# Altium PCB DB46.PcbDoc (part 1 of 6)
Units mm, origin at the board's own origin, x right, y up, seen from the top; angles counter-clockwise.
Board outline 82.2 x 113.2 mm, 8 copper layers (Top Layer, MidLayer1, MidLayer2, GND, MidLayer3, VCC, MidLayer4, Bottom Layer), stack 1.576 mm thick; 186 components, 477 nets, 1727 pads, 1538 vias.
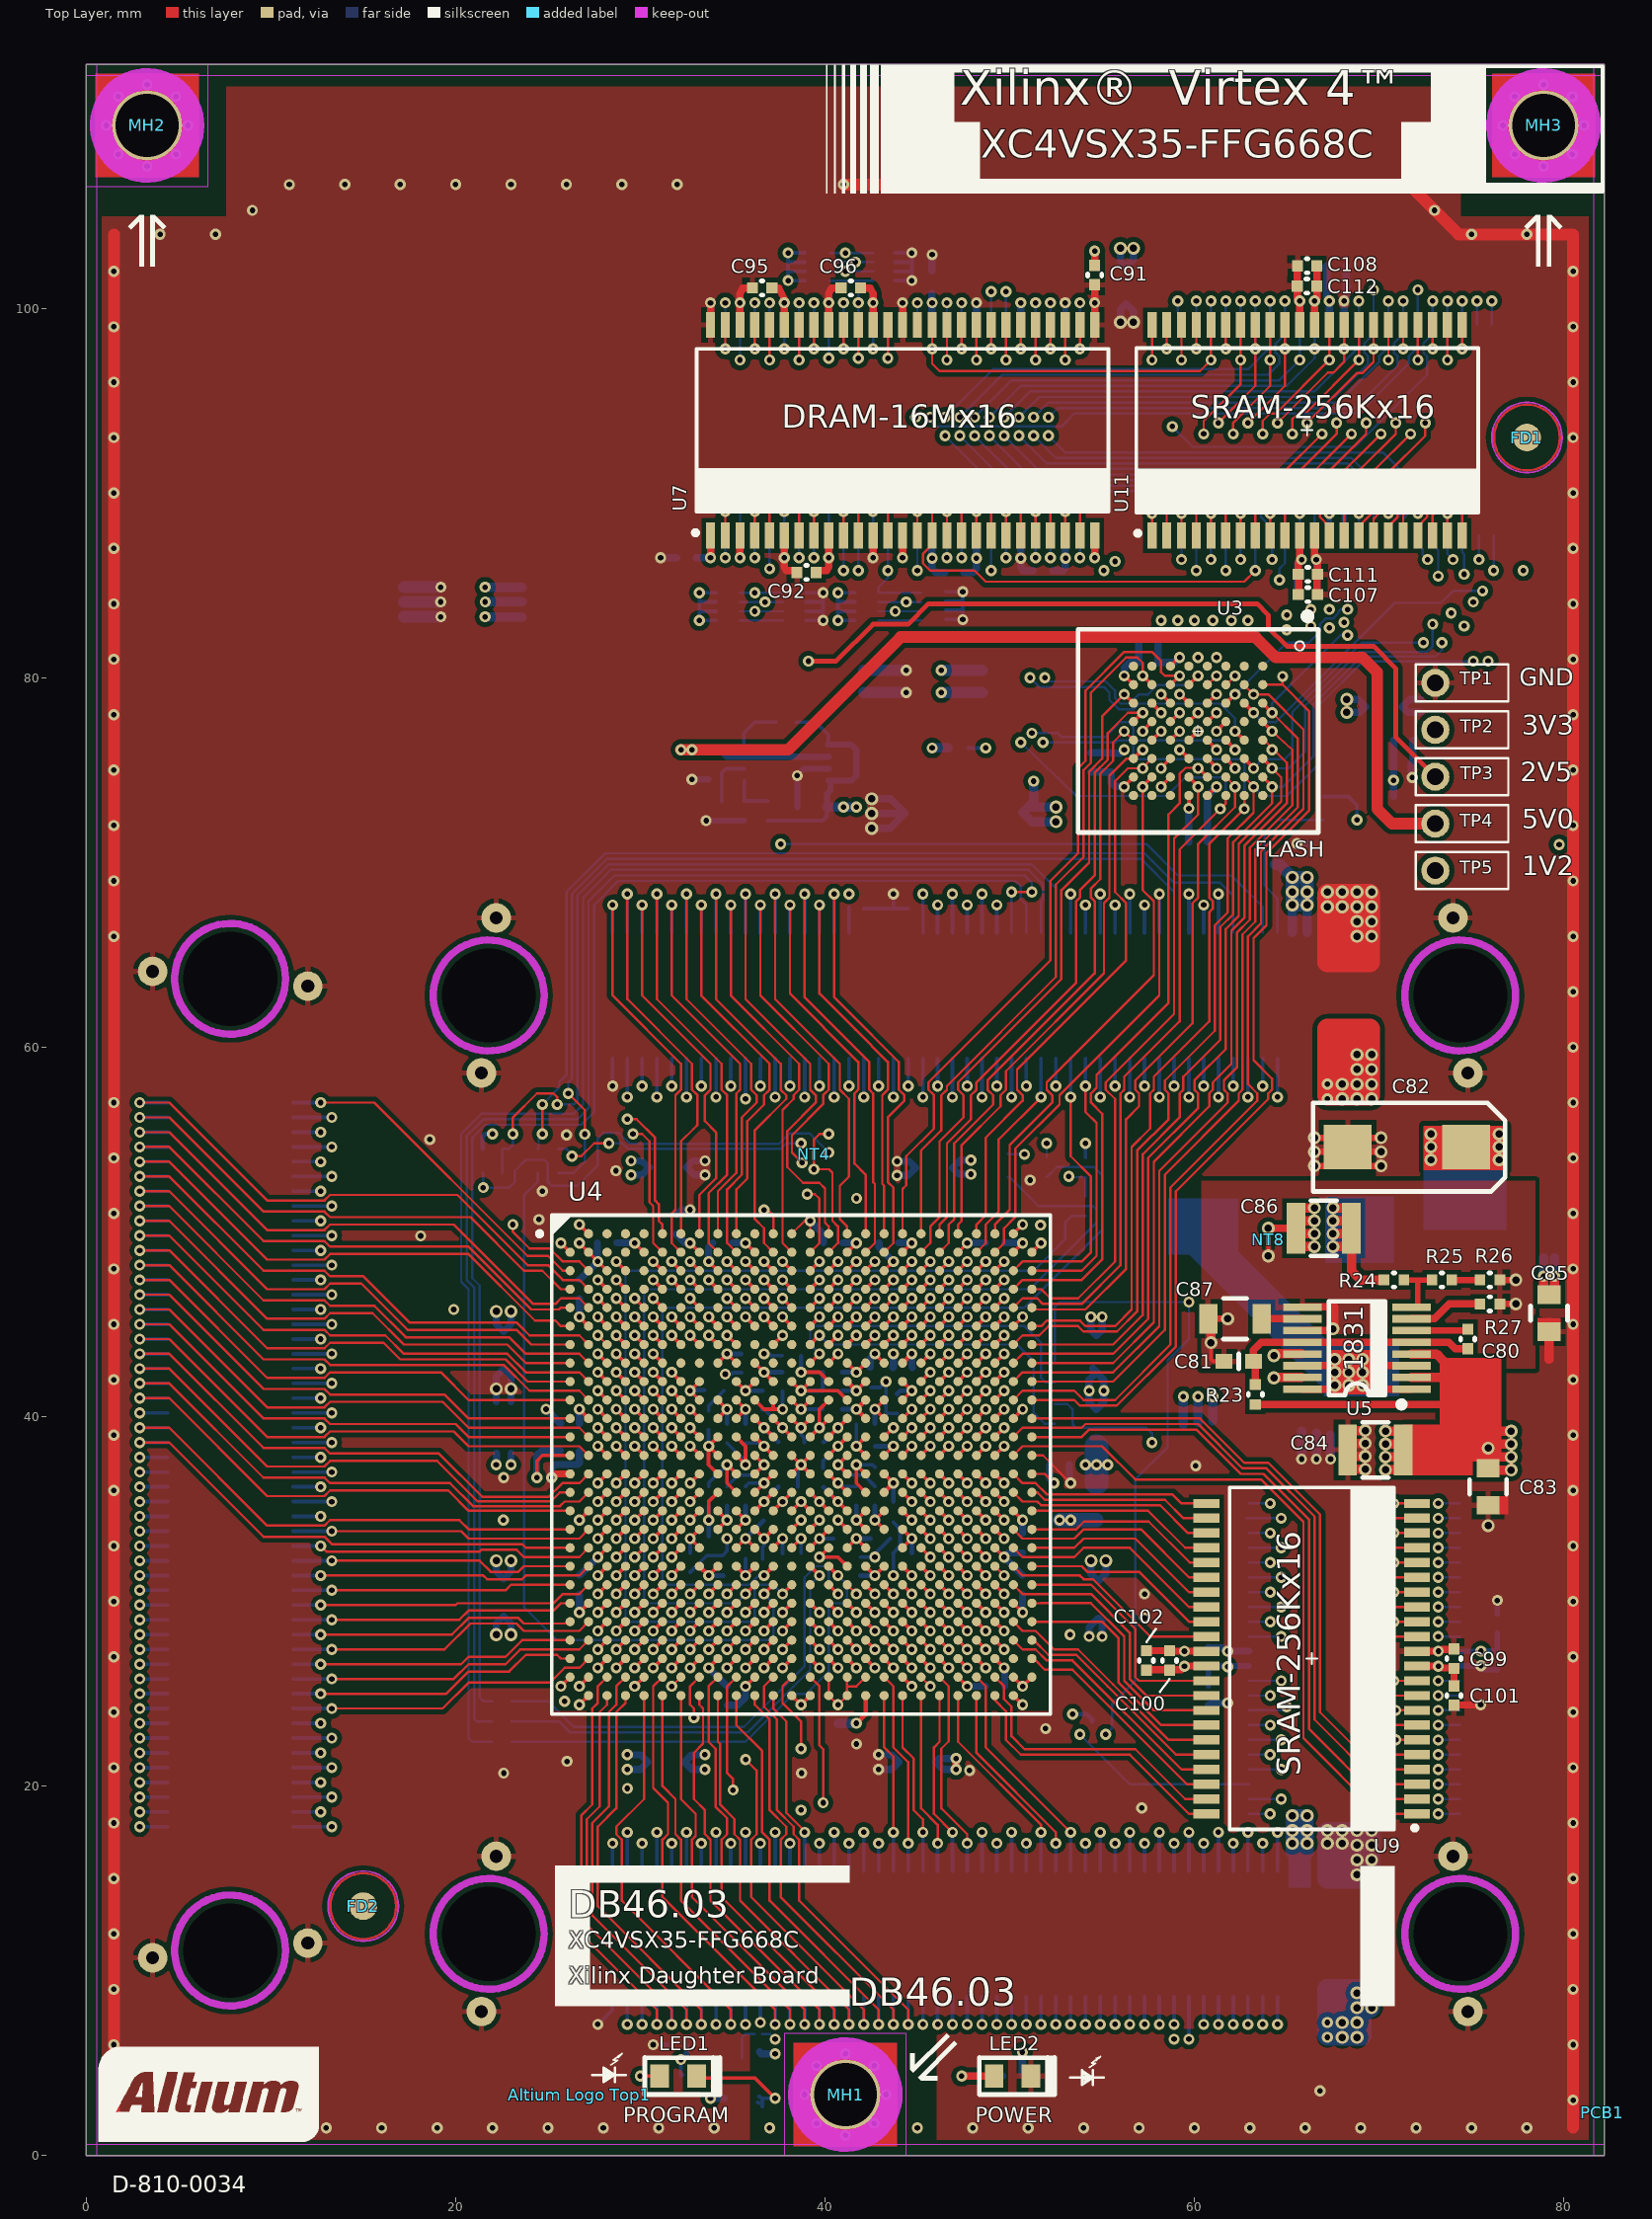
[diagram p0: Top Layer view]
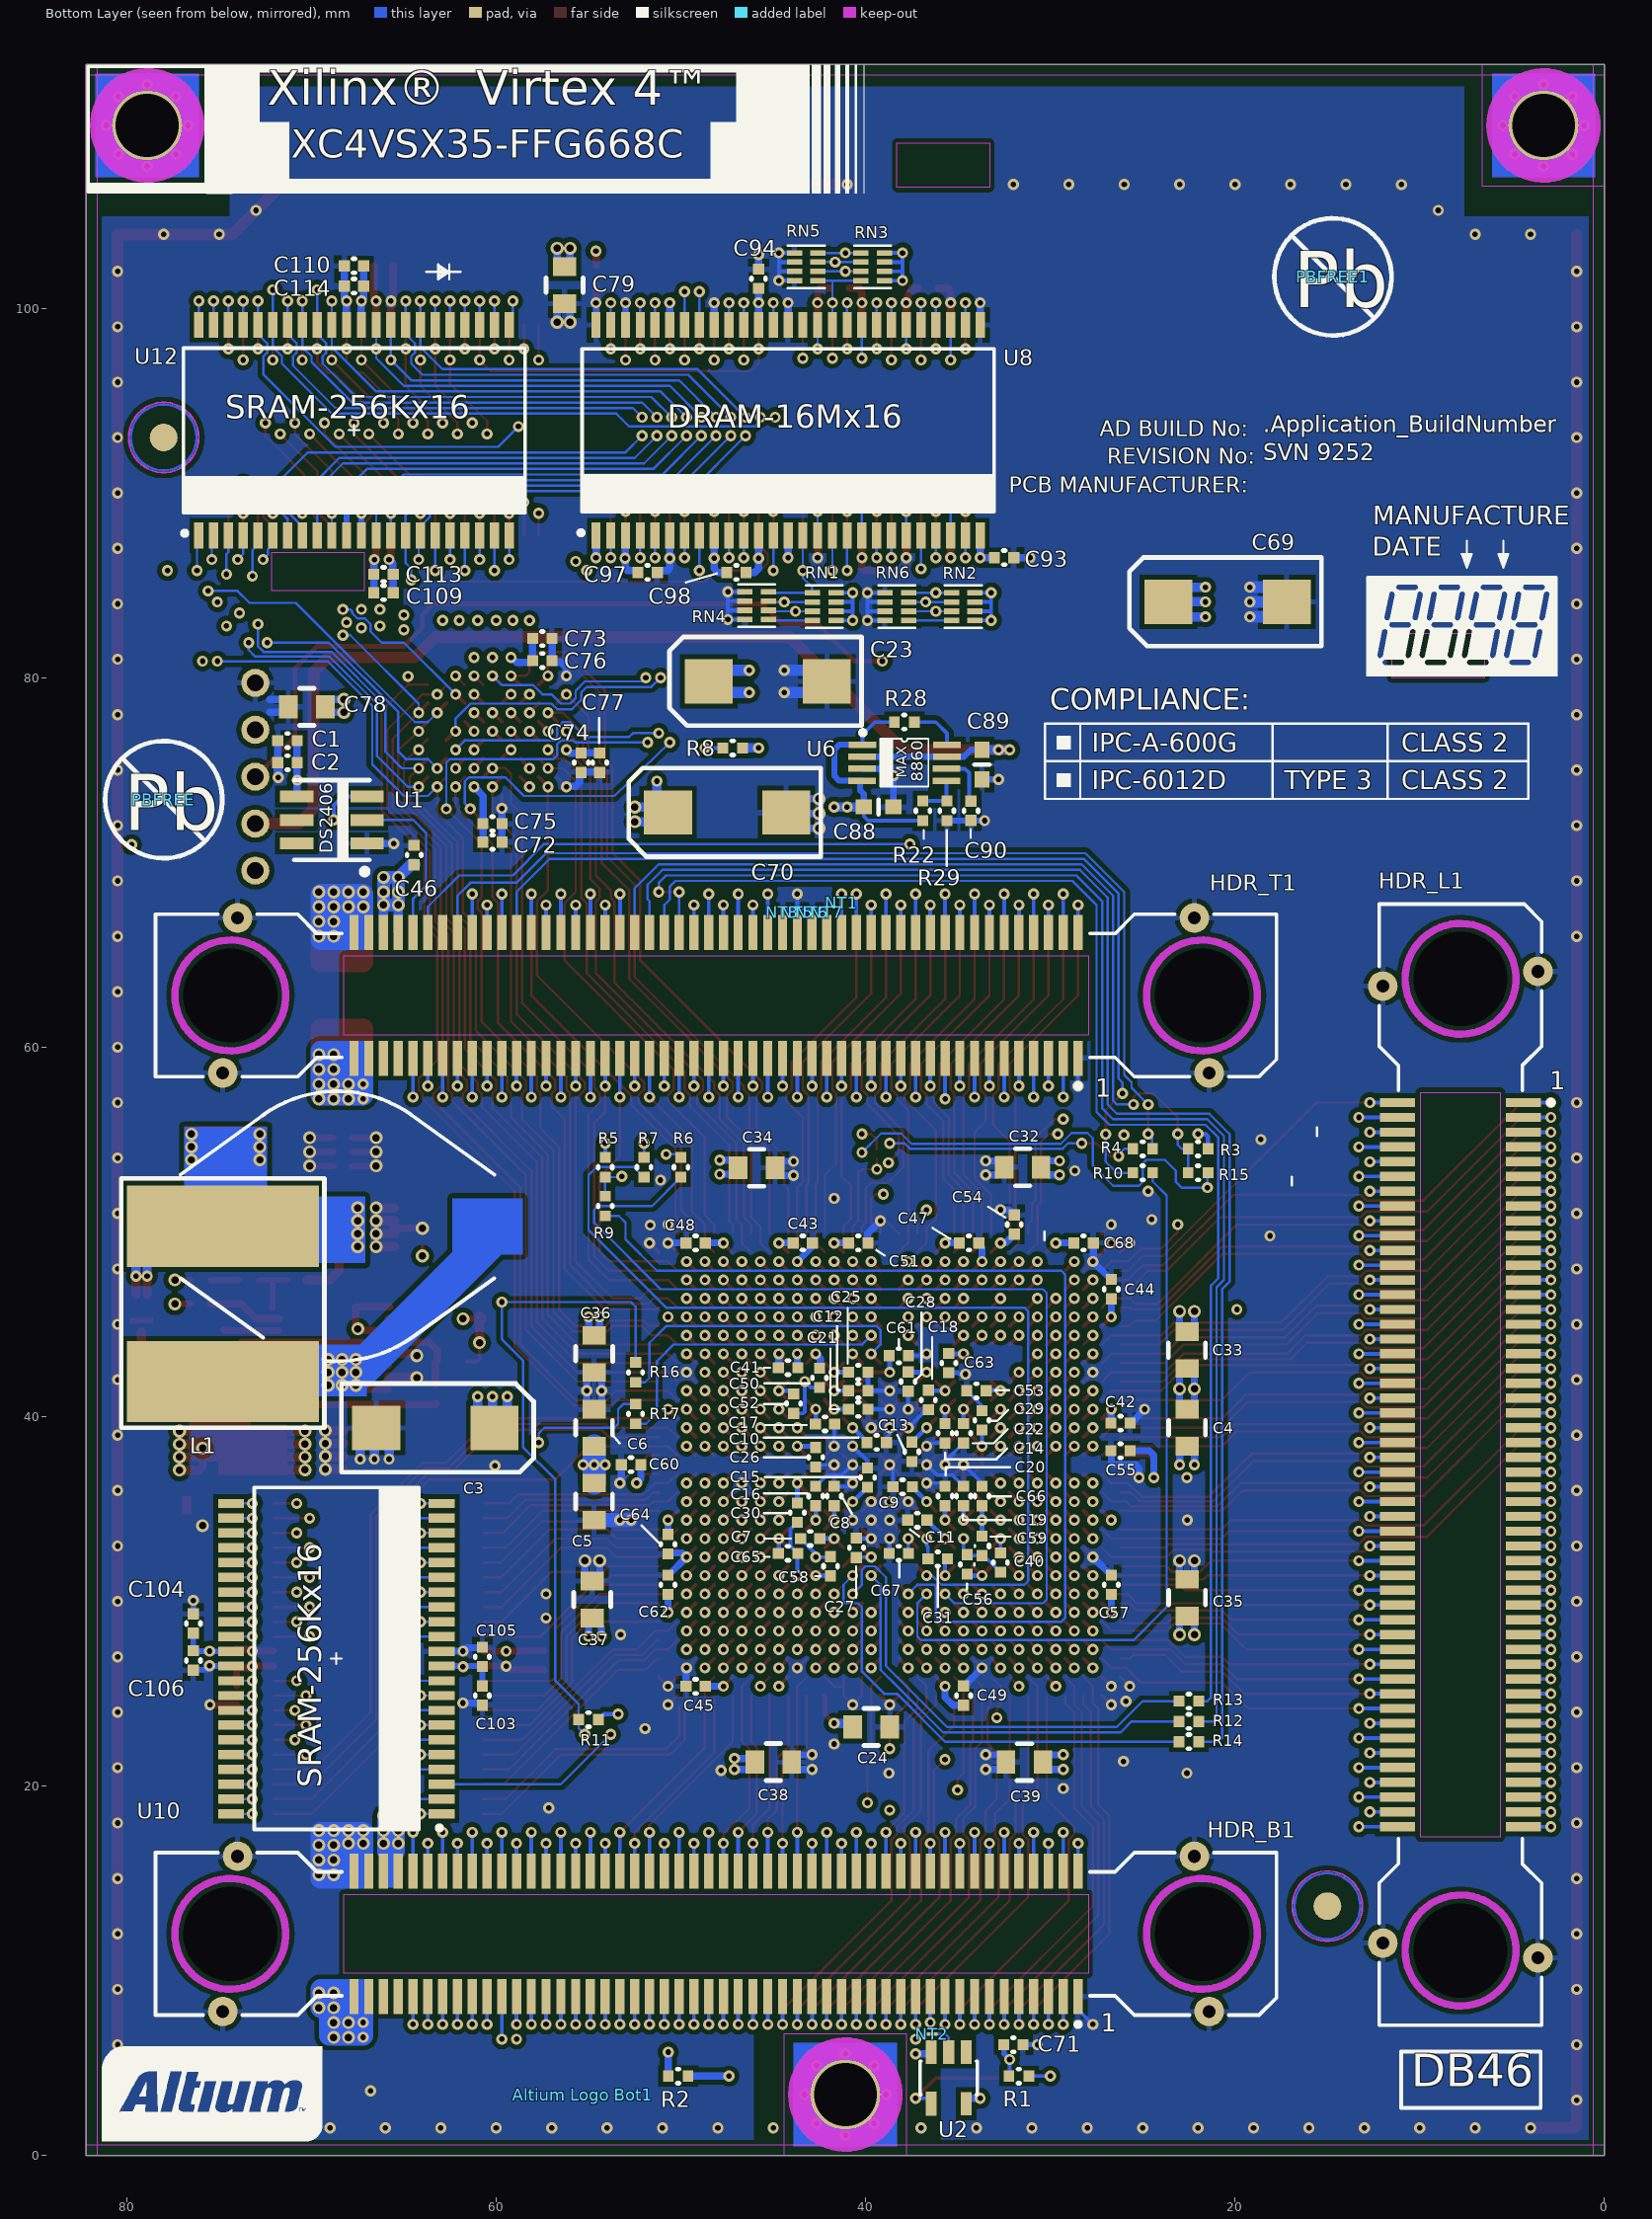
[diagram p1: Bottom Layer view, seen from below]
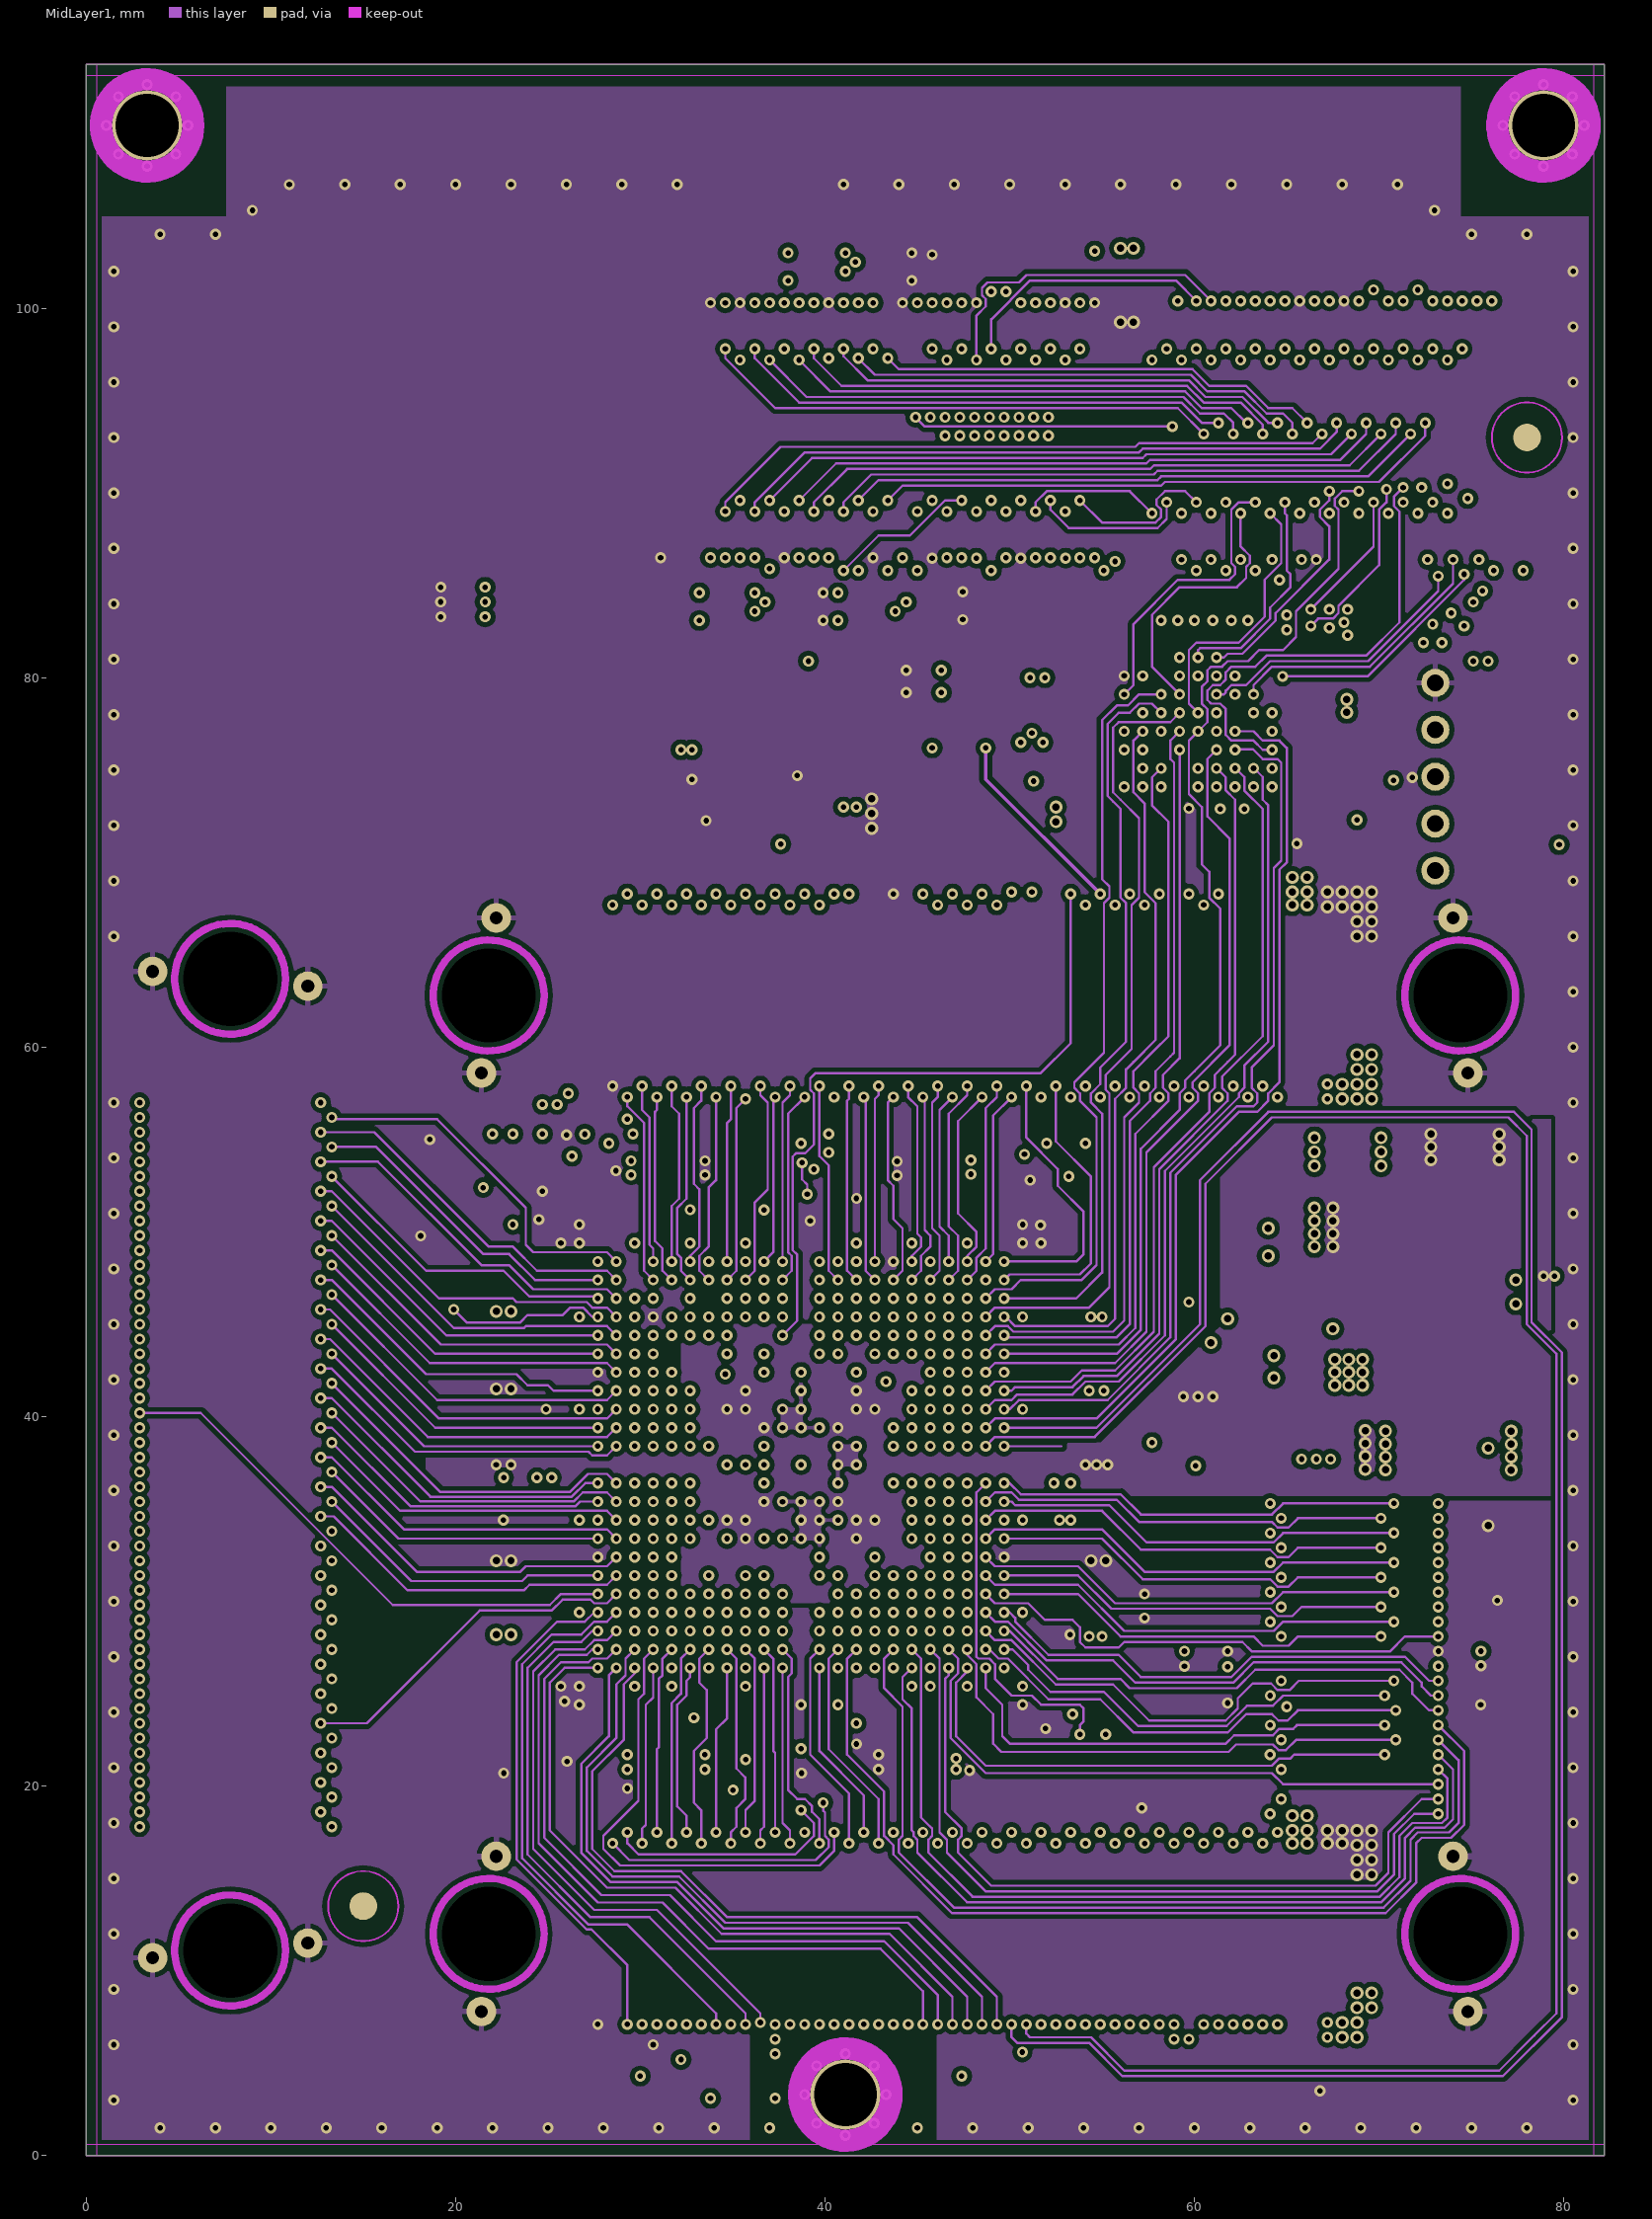
[diagram p2: MidLayer1]
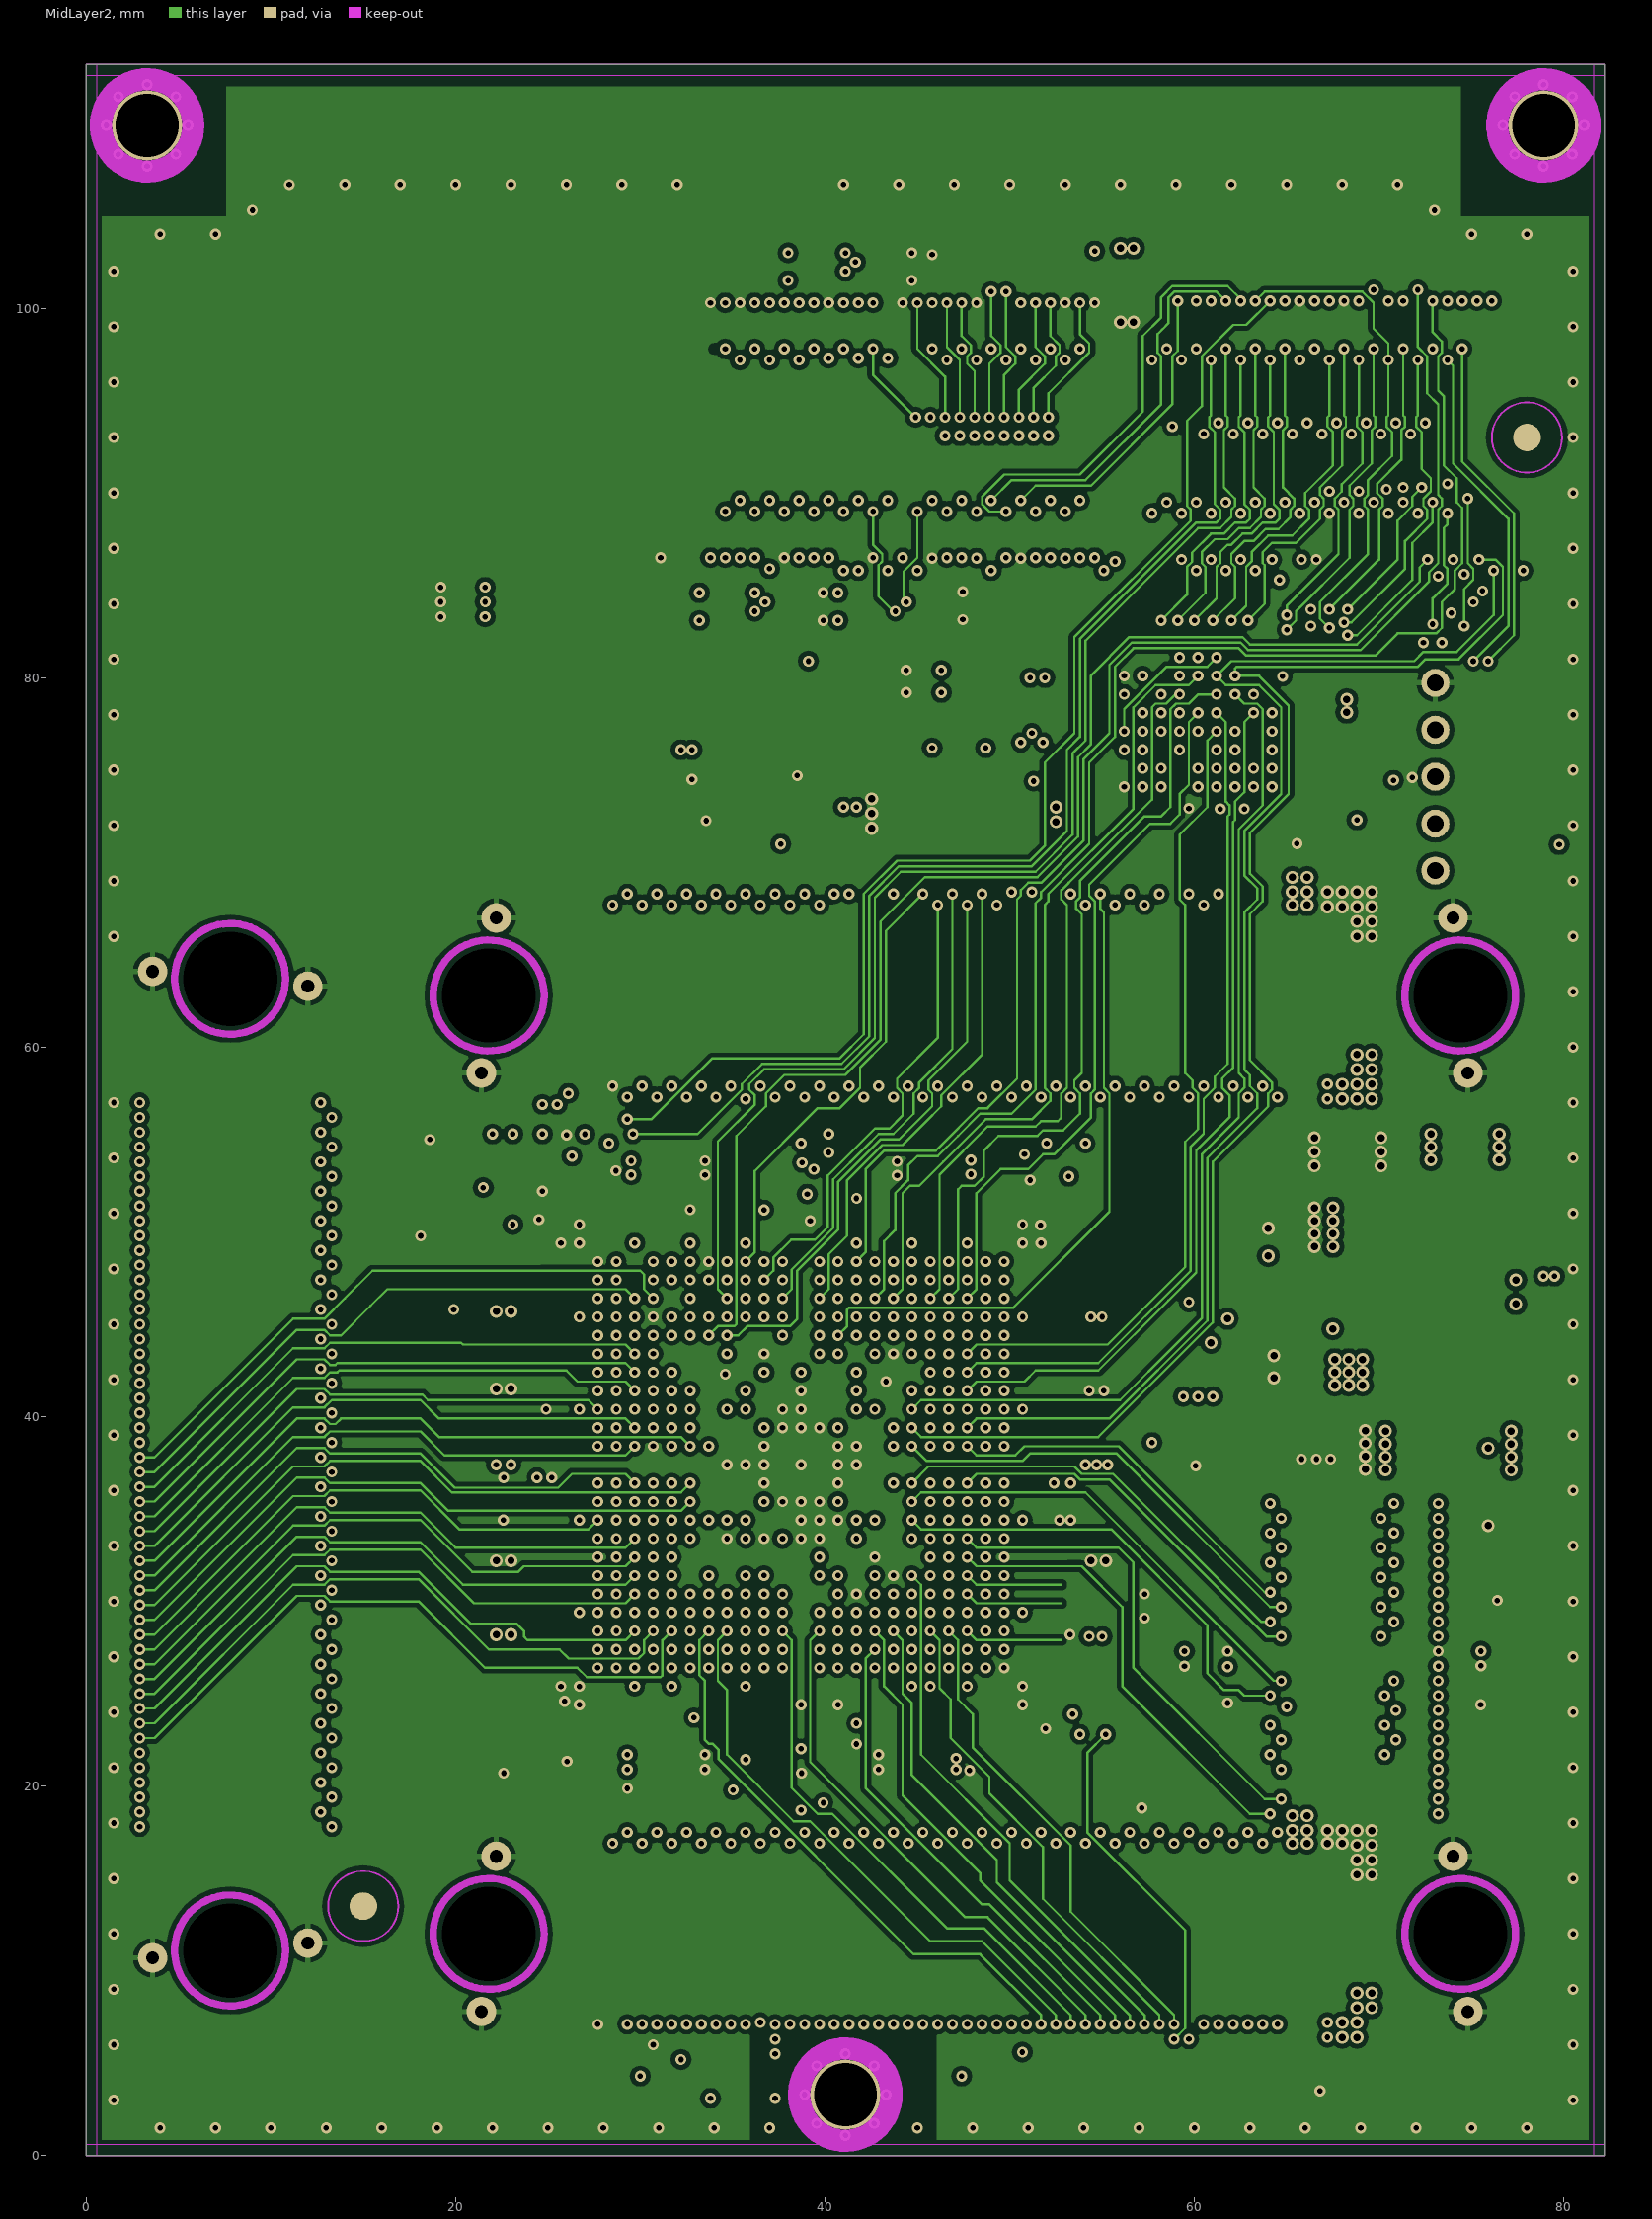
[diagram p3: MidLayer2]
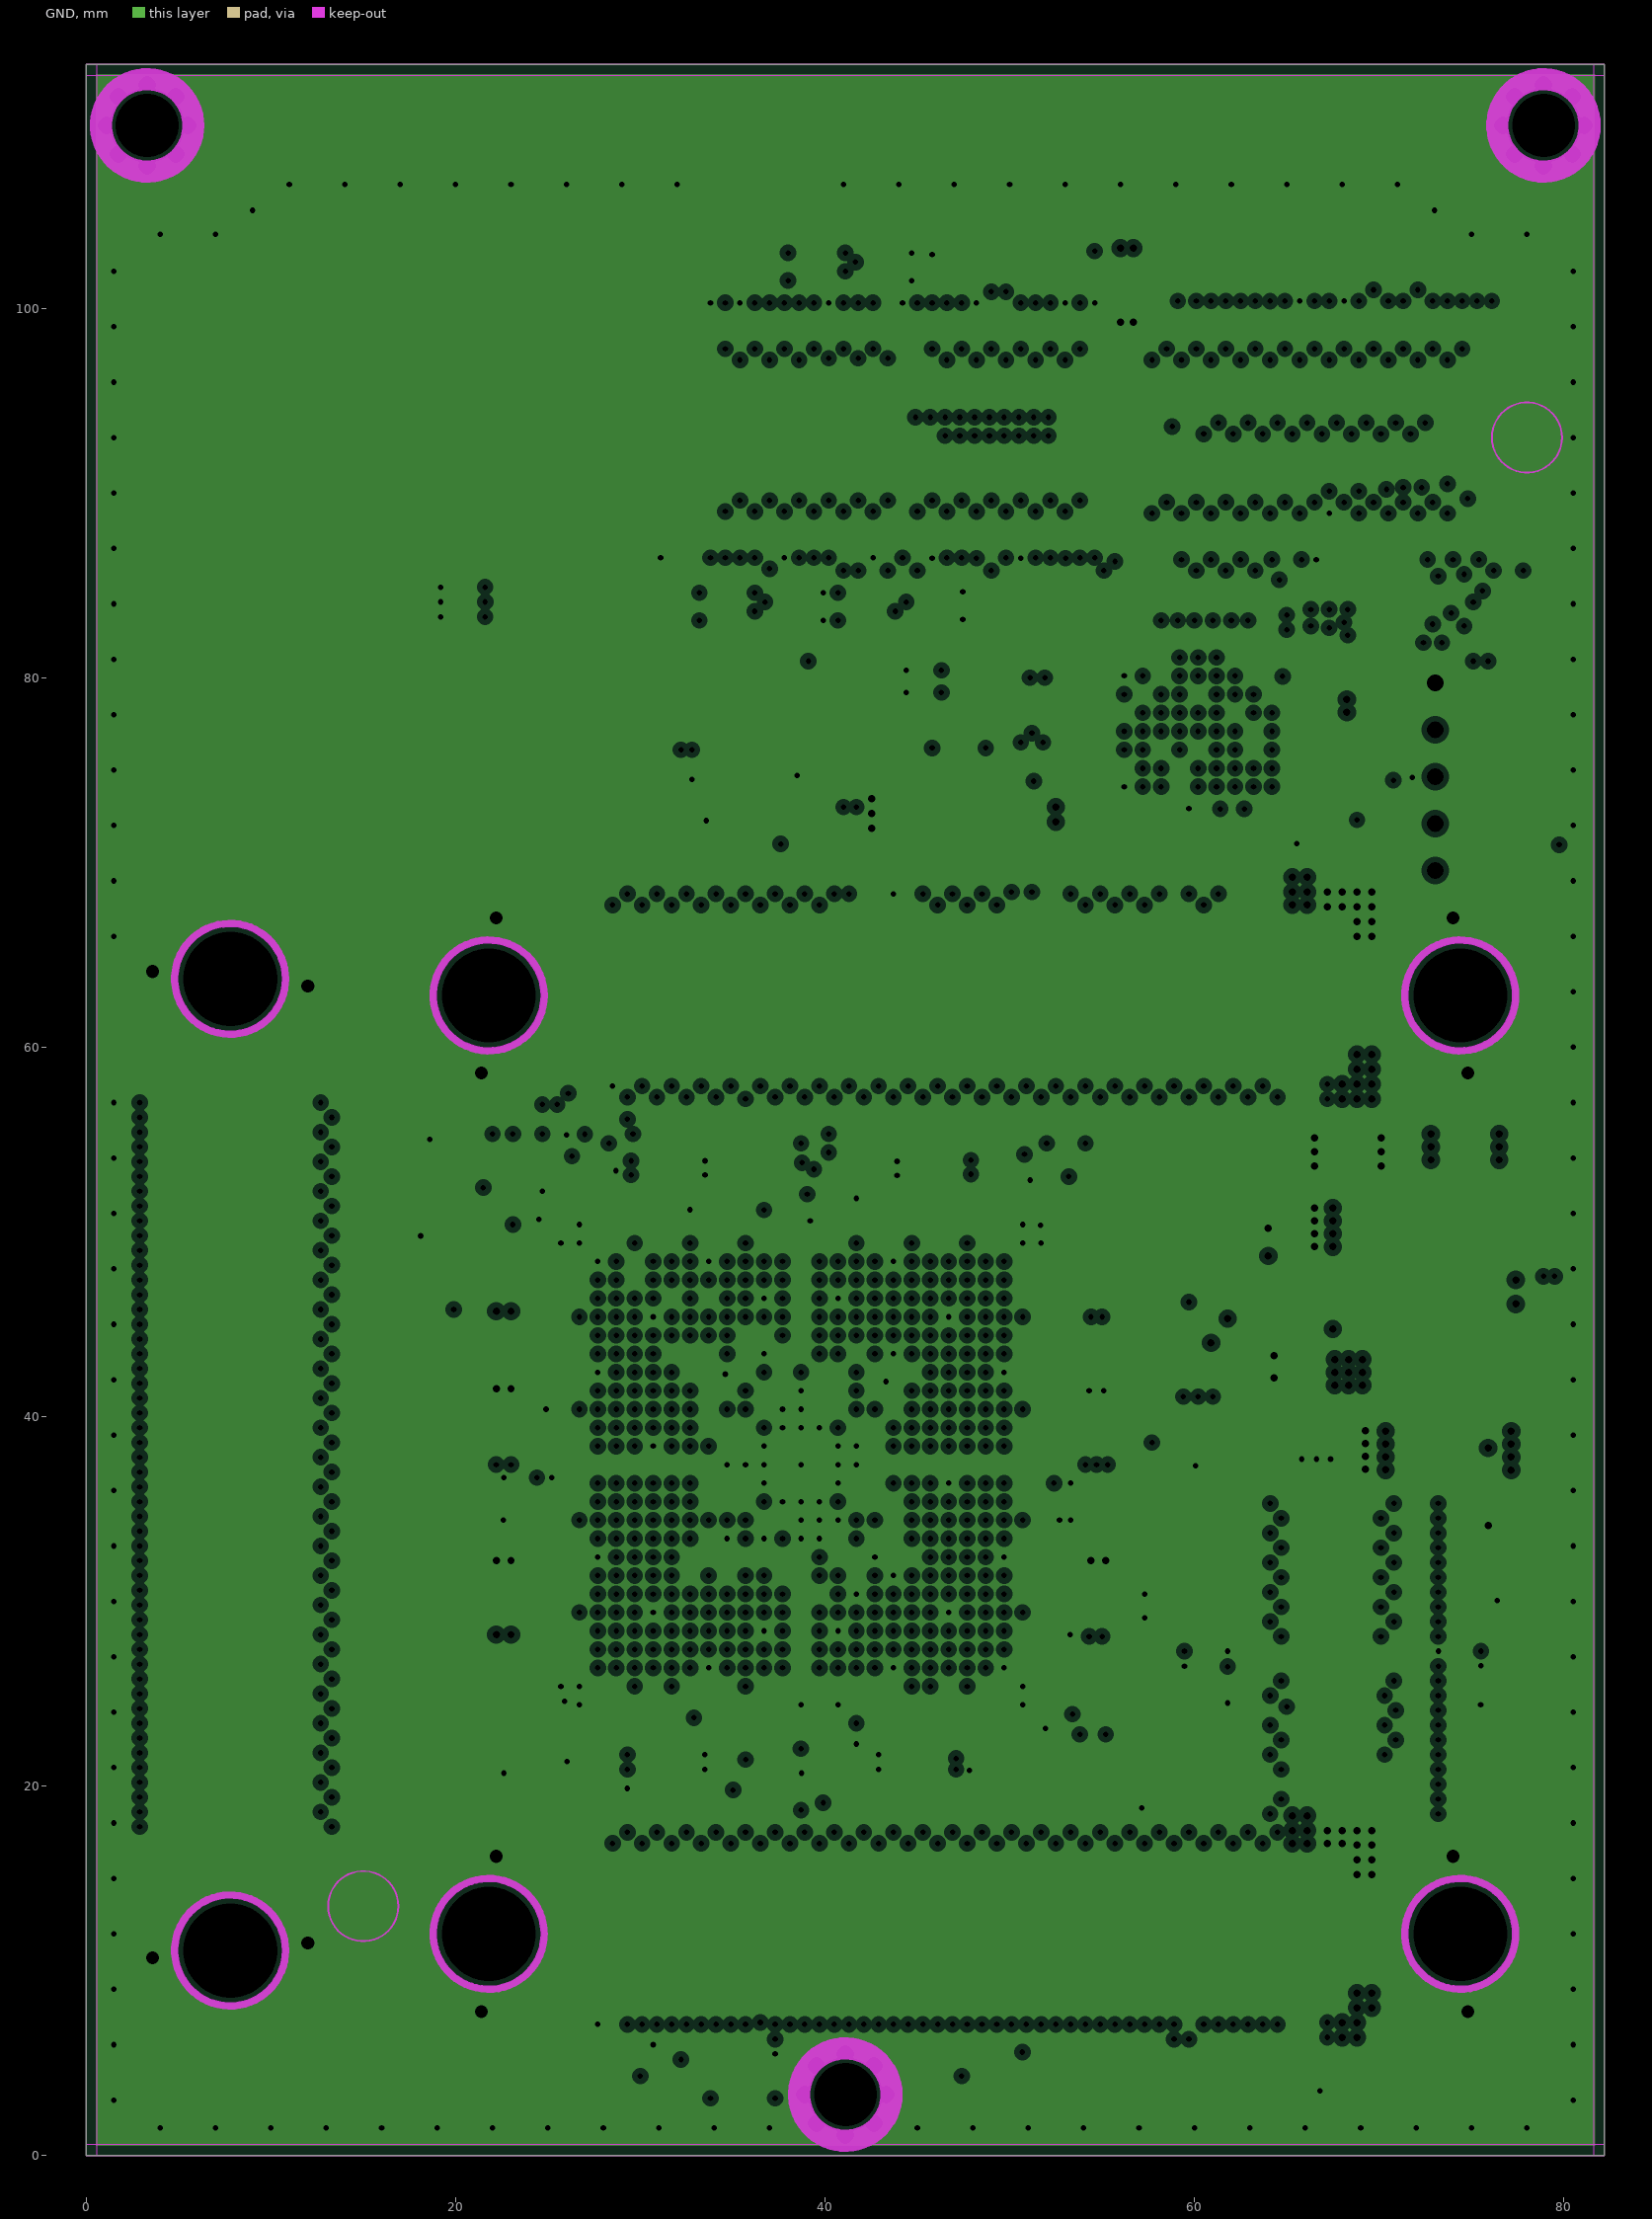
[diagram p4: GND, clearances drawn from the general rule]
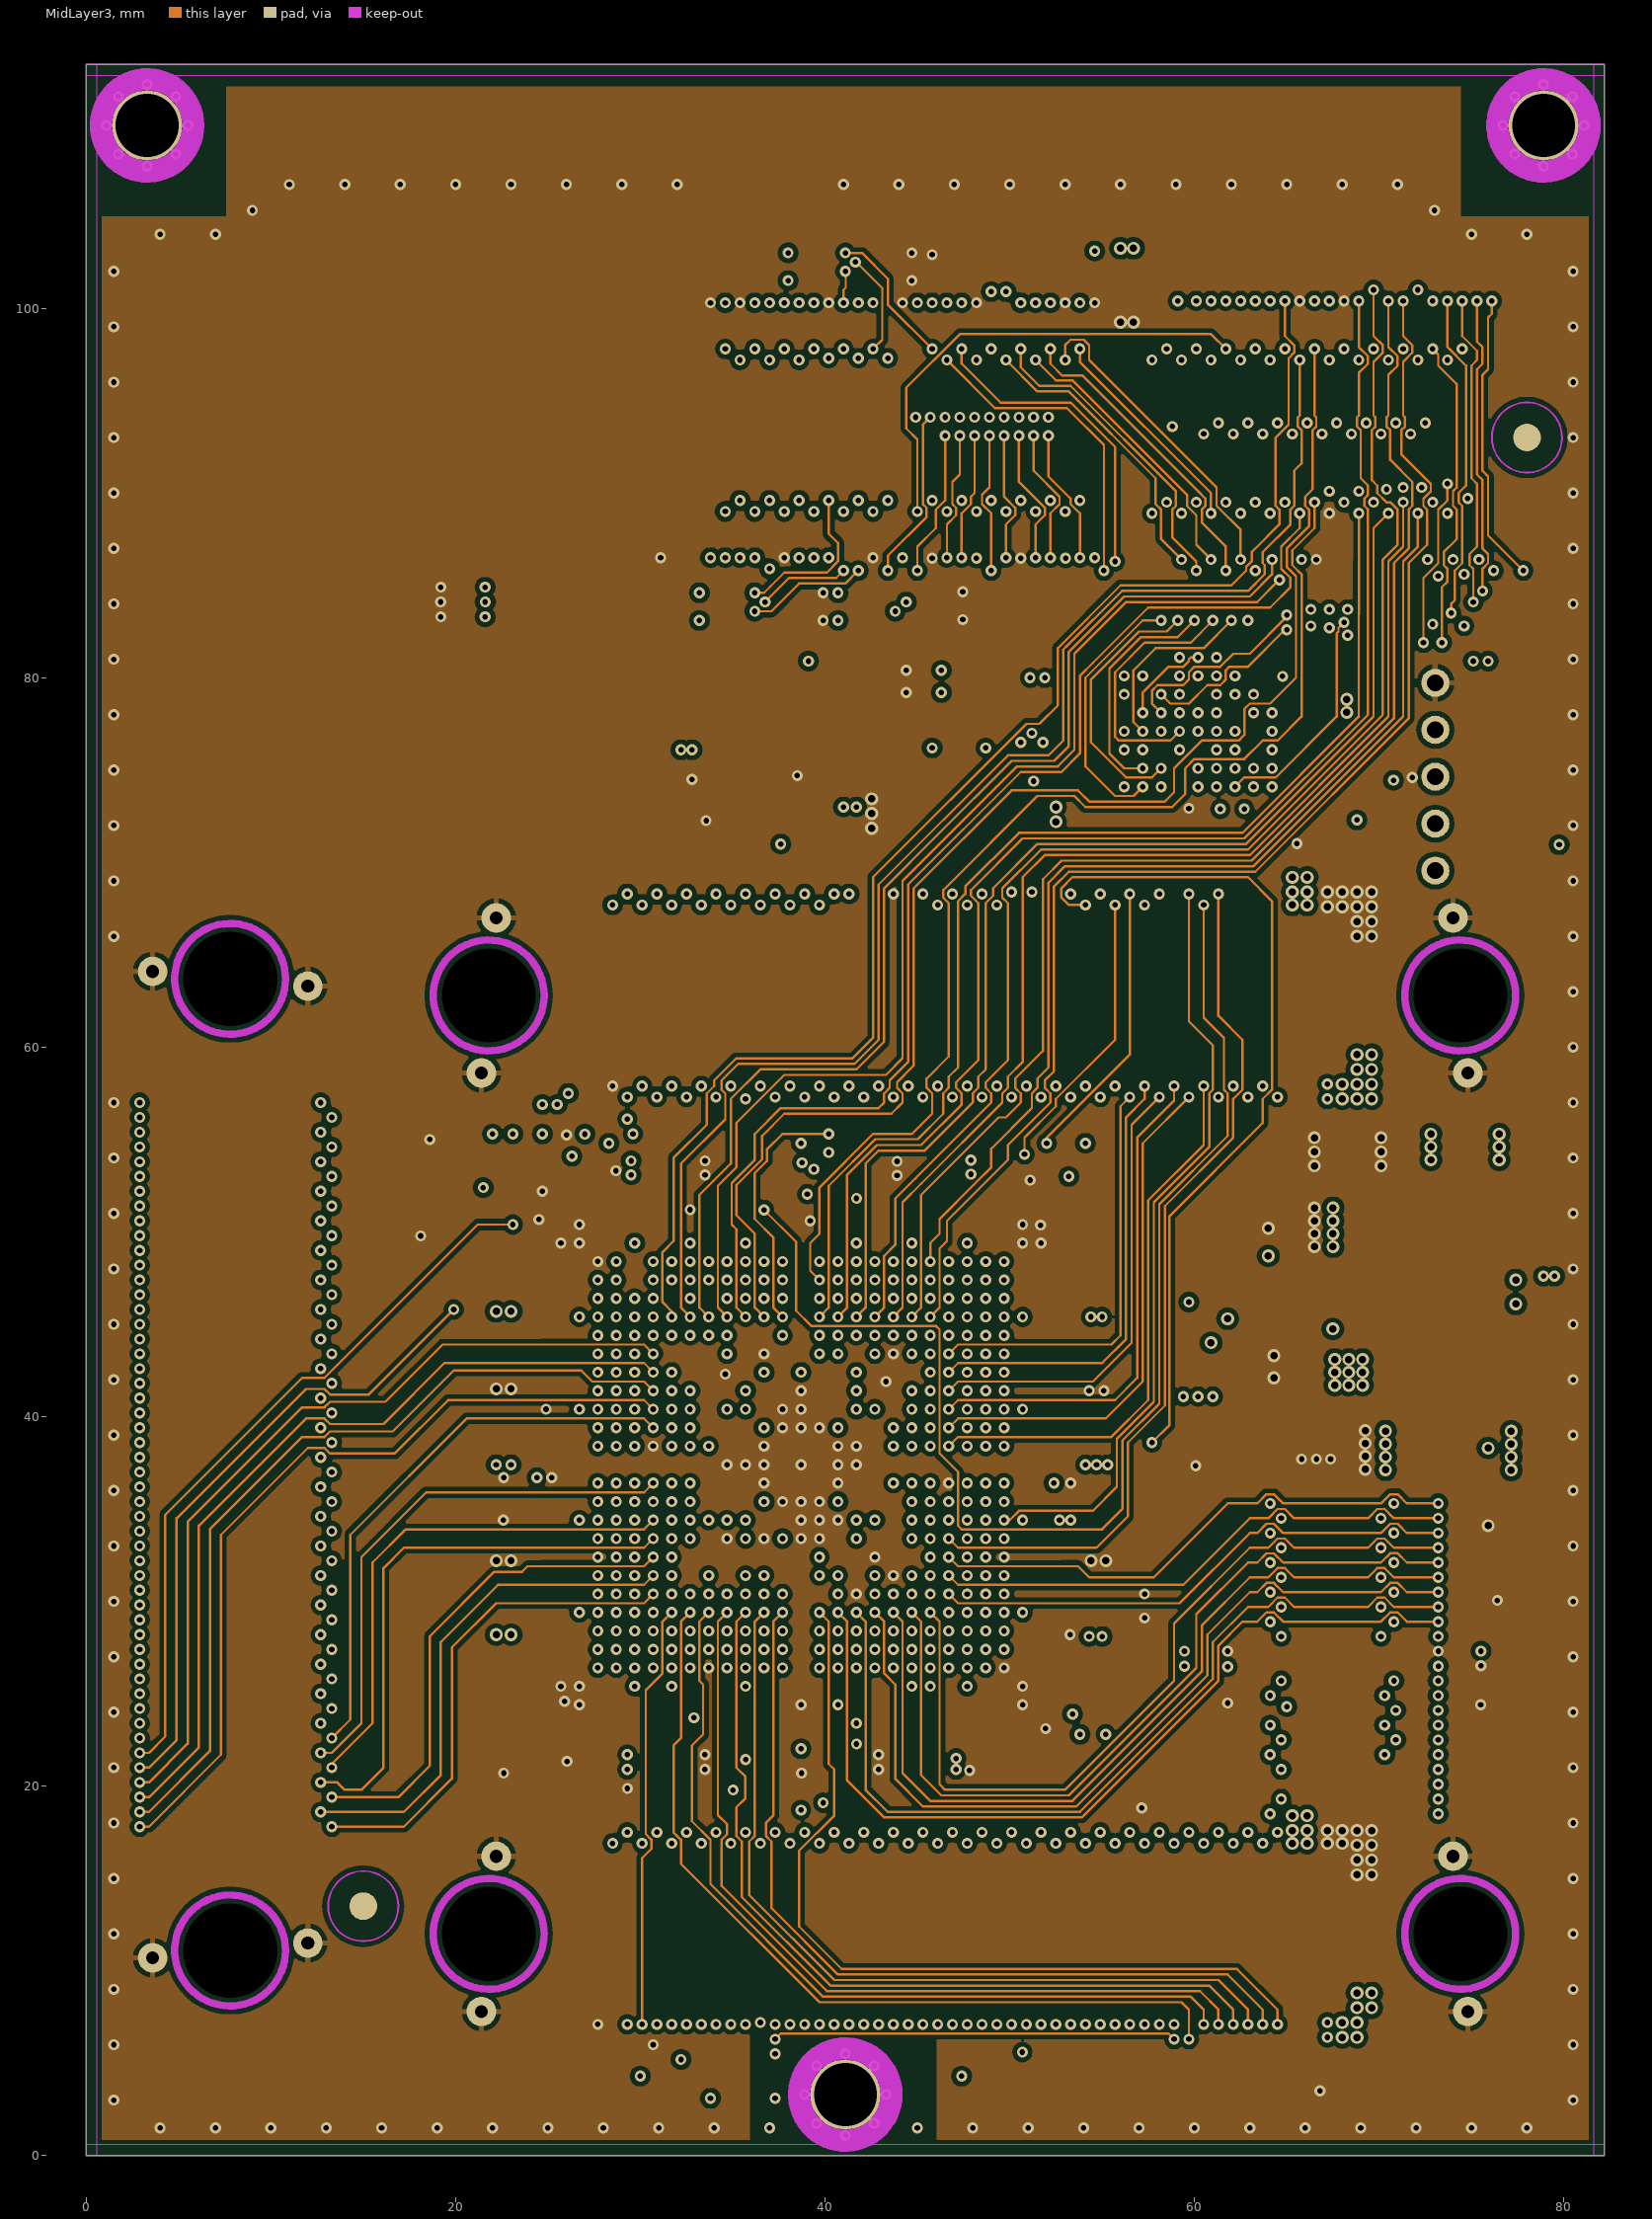
[diagram p5: MidLayer3]
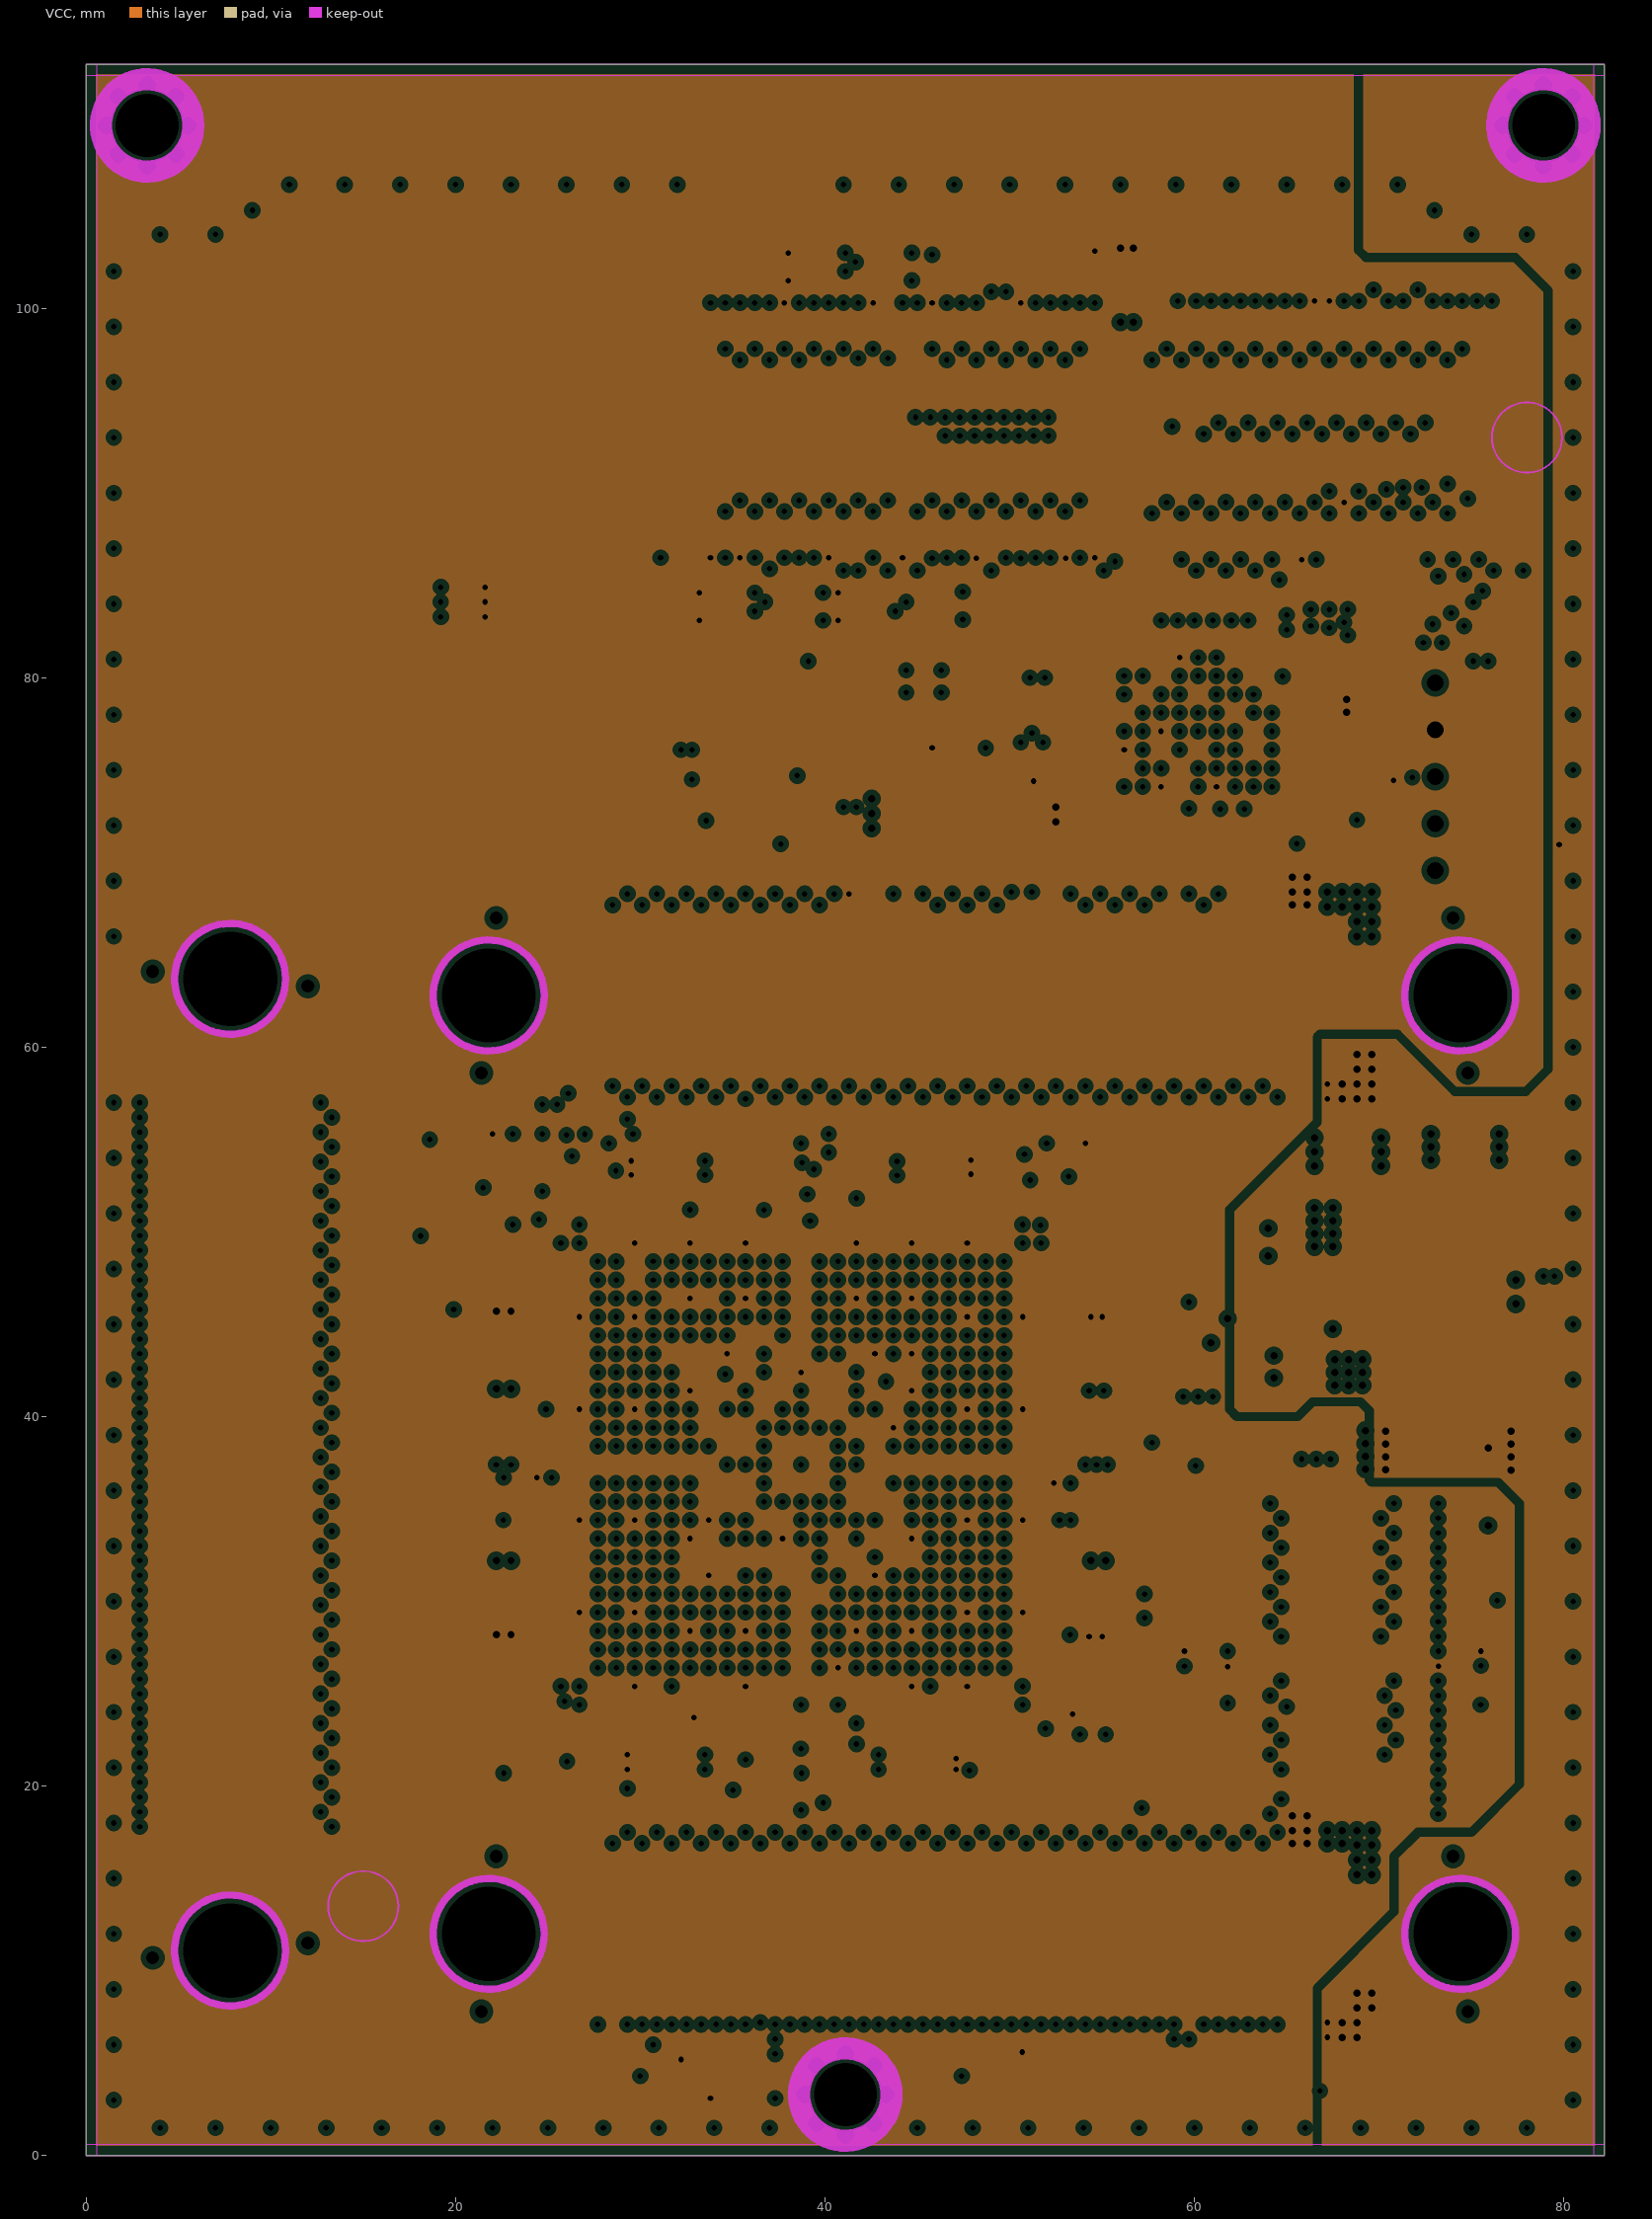
[diagram p6: VCC, clearances drawn from the general rule]
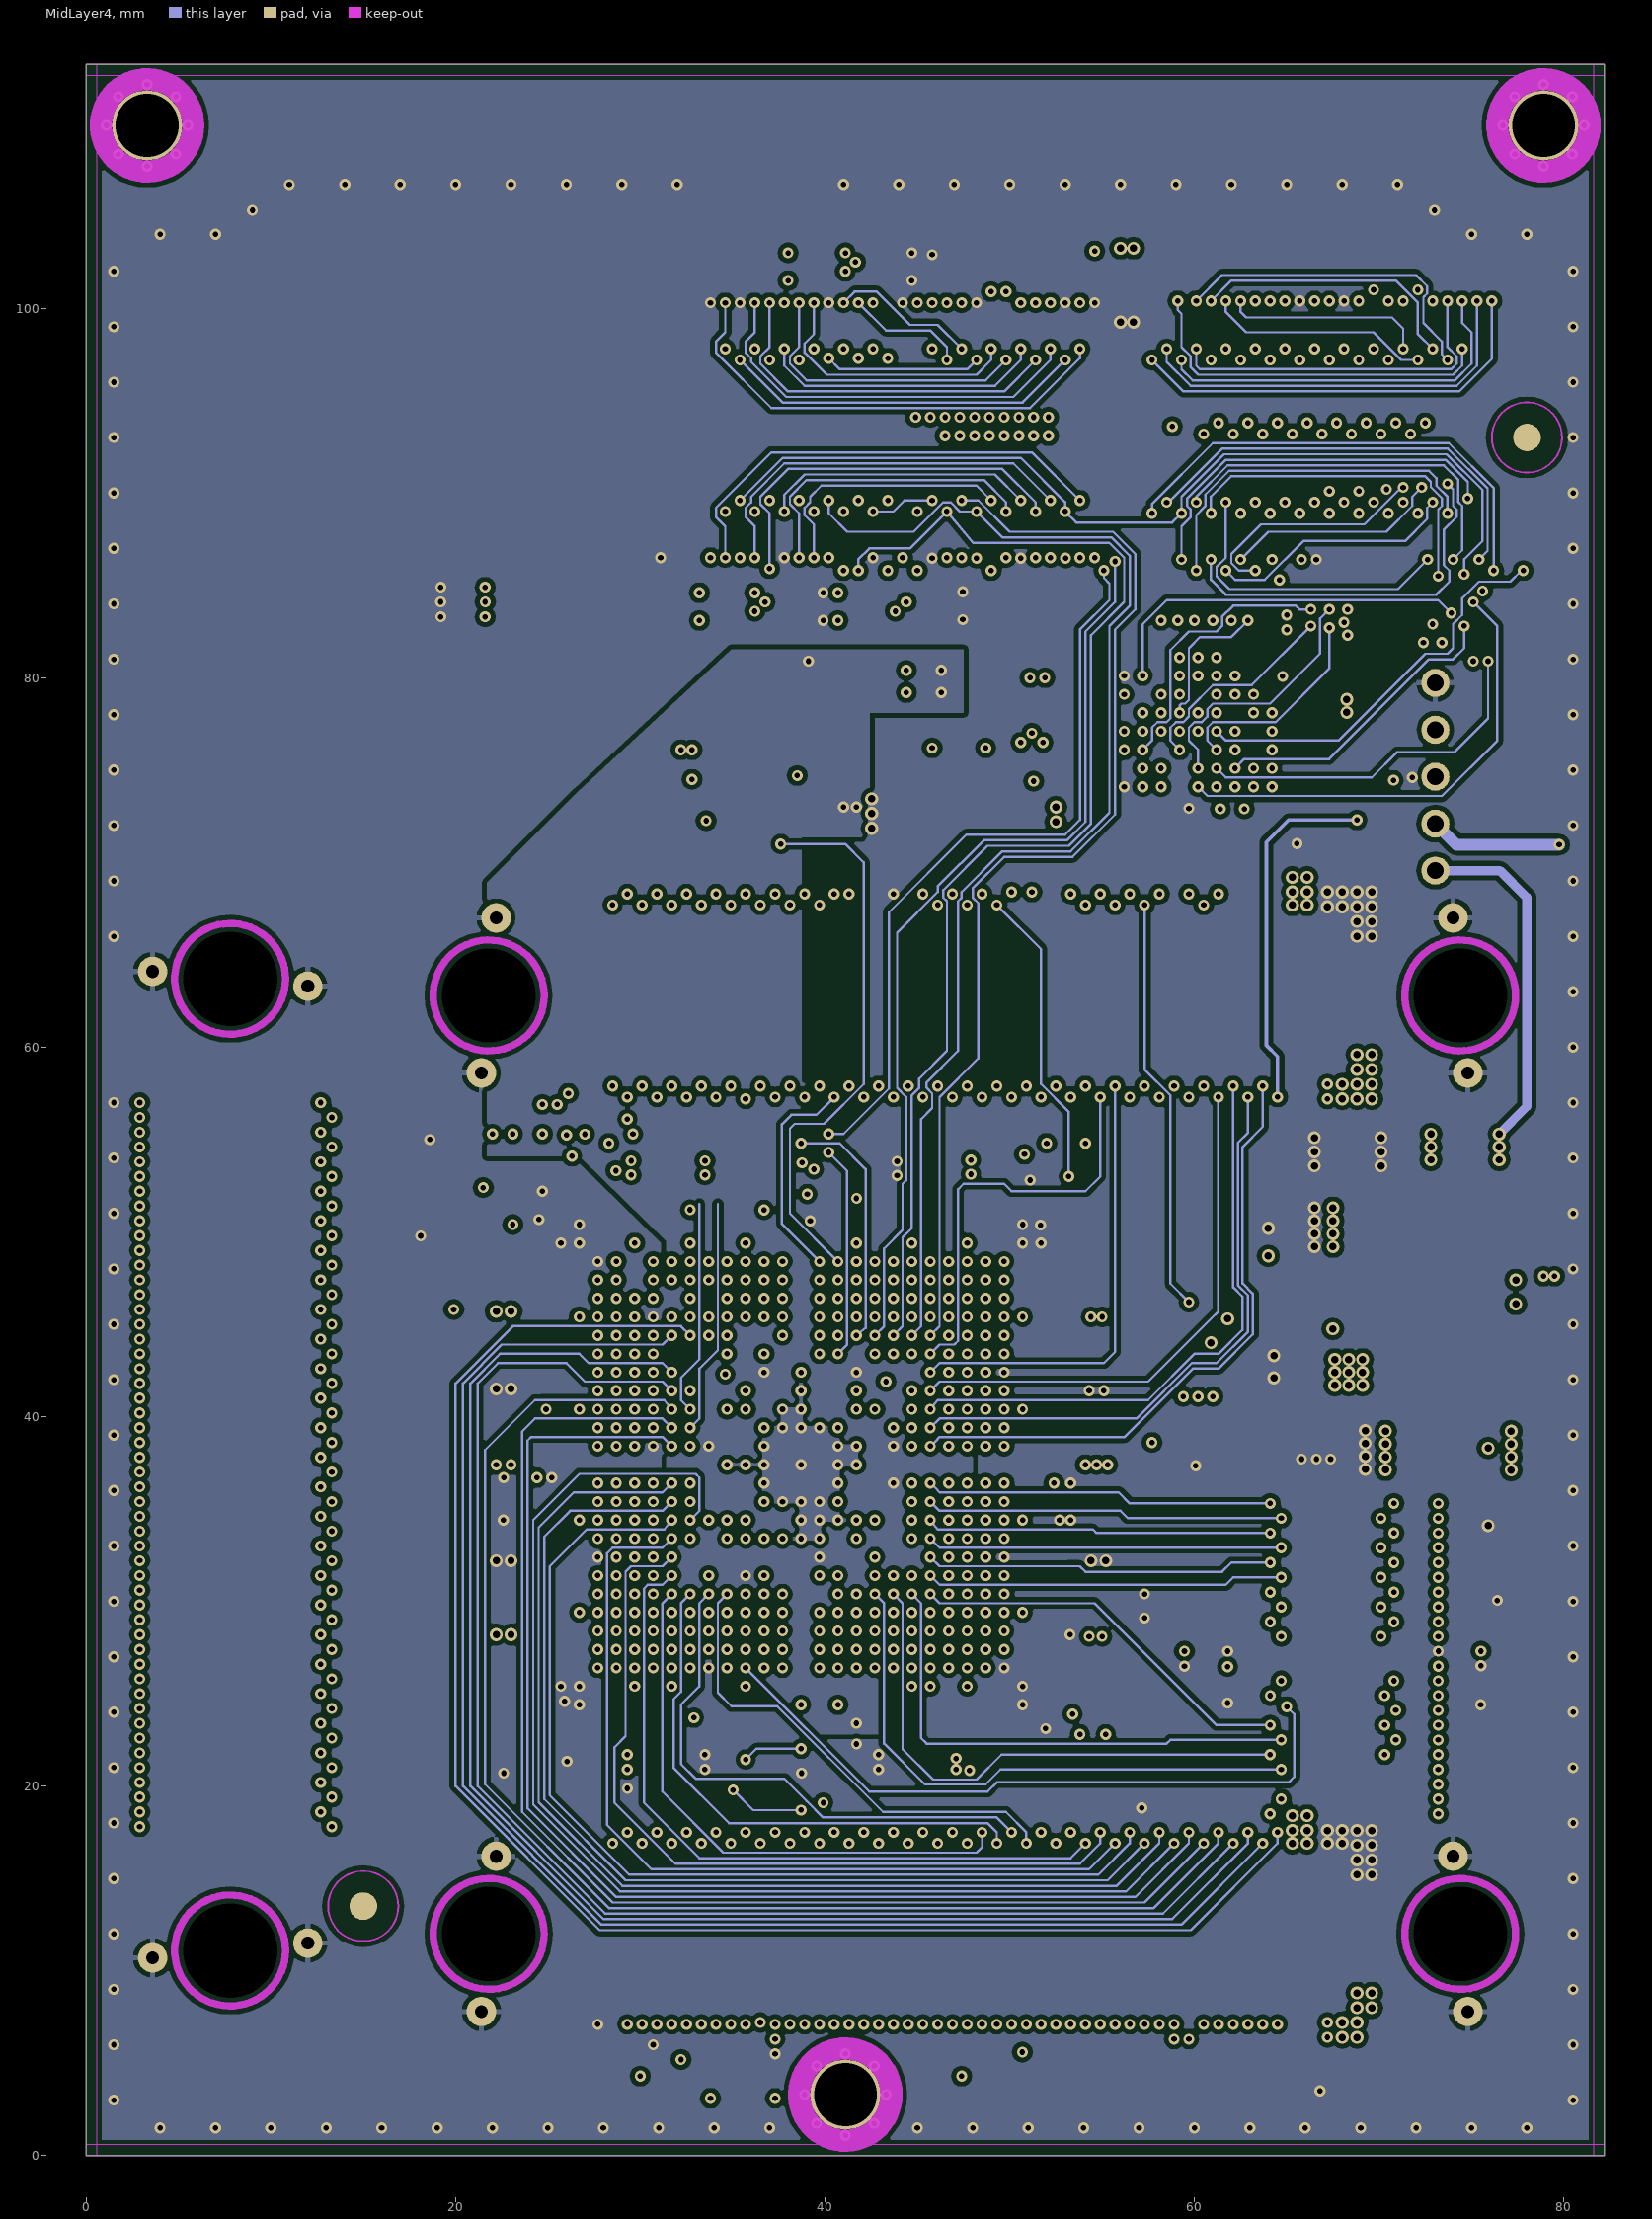
[diagram p7: MidLayer4]

## Layer stack, top to bottom
Top Layer: signal copper 0.0432
Dielectric: prepreg 0.127, FR-4, Dk 4.2
MidLayer1: signal copper 0.0356
Dielectric: core 0.254, FR-4, Dk 4.2
MidLayer2: signal copper 0.0356
Dielectric: prepreg 0.133, FR-4, Dk 4.2
GND: plane copper 0.036, net GND
Dielectric: core 0.254, FR-4, Dk 4.2
MidLayer3: signal copper 0.0356
Dielectric: prepreg 0.127, FR-4, Dk 4.2
VCC: plane copper 0.0356, net (Multiple Nets)
Dielectric: core 0.254, FR-4, Dk 4.2
MidLayer4: signal copper 0.0356
Dielectric: prepreg 0.127, FR-4, Dk 4.2
Bottom Layer: signal copper 0.0432

## Board outline
0,0 0,113.2 38.7,113.2 82.2,113.2 82.2,0

## Design rules (kind name [scope] priority, off if disabled: settings)
Clearance Clearance_Poly_Tight [InNamedPolygon('FPGAPWR-BL-1V2') Or InNamedPolygon('FPGAPWR-BL-3V3') Or InNamedPolygon('FPGAPWR-BL-2V5A') Or InNamedPolygon('FPGAPWR-BL-2V5B') Or InNamedPolygon('FPGAPWR-BL-2V5C') Or InNamedPolygon('FPGAPWR-BL-2V5D') Or InNamedPolygon('FPGAPWR-ML1-1V2') Or InNamedPolygon('FPGAPWR-BL-2V5E') Or InNamedPolygon('1V2-CONNECT-TO-L1-C17' ) Or InNamedPolygon('2V5') Or InNamedPolygon('LX') Or InNamedPolygon('2V5-TOP-CAP') Or InNamedPolygon('AGND-TOP')] p1: gap=0.127
Clearance Clearance_Polygon [InPolygon] p2: gap=0.254
Clearance "Pad-Pad Clearance Same Net" [IsPad vs IsPad] p3: gap=0.127
Clearance "General Clearance" [All] p4: gap=0.127
ComponentClearance [All] p1 off: gap=0.2 collisioncheckmode=3 verticalgap=0.254 showdistances=FALSE
DiffPairsRouting [All] p1 off: maxlimit=0.254 minlimit=0.254 mostfreqgap=0.254 maxuncoupledlength=12.7
FabricationTestPointUsage TestPointUsage [All] p1 off: valid=0 allowmultiple=FALSE
FabricationTestpoint Testpoint [All] p1 off: side=3 testpointundercomponent=TRUE minsize=1.016 maxsize=2.54 preferedsize=1.524 minholesize=0 maxholesize=1.016 preferedholesize=0.813 testpointgrid=0.025 allowsidetop=TRUE allowsidebottom=TRUE usegrid=TRUE gridtolerance=0
HoleSize [All] p1: absolutevalues=TRUE maxlimit=5.2 minlimit=0 maxpercent=80.000 minpercent=20.000
MatchedLengths DiffPair_MatchedLengths [(IsDifferentialPair And (Name = 'HDMI_D0')) Or (IsDifferentialPair And (Name = 'HDMI_D1')) Or (IsDifferentialPair And (Name = 'HDMI_D2')) Or (IsDifferentialPair And (Name = 'HDMI_CLK'))] p1: tolerance=25.4 checknetsindiffpair=TRUE checkdiffpairvsdiffpair=TRUE checkothers=TRUE
MatchedLengths DiffPair_MatchedLengths_1 [(IsDifferentialPair And (Name = 'DIFF_RX1'))] p2: tolerance=25.4 checknetsindiffpair=TRUE checkdiffpairvsdiffpair=TRUE checkothers=TRUE
MinimumAnnularRing MinimumAnnularRing_NonPlated [(ObjectKind = 'Pad') And (HoleDiameter >= '0.7') And (PadIsPlated = 'False')] p1: minimumring=-5
MinimumAnnularRing [All] p2: minimumring=0.15
MinimumSolderMaskSliver [All] p1: minsoldermaskwidth=0.102
PlaneClearance [All] p1: clearance=0.3
PlaneConnect [All] p1: planeconnectstyle=Direct reliefexpansion=0.5 reliefentries=4 reliefconductorwidth=0.25 reliefairgap=0.25
PolygonConnect PolygonConnect_Via [IsVia] p1: connectstyle=Direct reliefconductorwidth=0.254 reliefentries=4 polygonreliefangle="90 Angle"
PolygonConnect "PolygonConnect - Heatsink" [(HasFootprint('TO-263') AND InNet('VCCINT'))] p2: connectstyle=Direct reliefconductorwidth=0.254 reliefentries=4 polygonreliefangle="90 Angle"
PolygonConnect [All] p3: connectstyle=Relief reliefconductorwidth=0.3 reliefentries=4 polygonreliefangle="90 Angle"
RoutingLayers [All] p1: top layer_v5=FALSE mid layer 1_v5=FALSE mid layer 2_v5=FALSE mid layer 3_v5=FALSE mid layer 4_v5=FALSE bottom layer_v5=FALSE
RoutingVias [All] p1: holewidth=0.3 width=0.6 viastyle="Through Hole" minholewidth=0.3 minwidth=0.6 maxholewidth=0.5 maxwidth=0.9
ShortCircuit ShortCircuit_1 [Net = 'No Net' vs Net = 'No Net'] p1: allowed=TRUE
ShortCircuit [All] p2: allowed=FALSE
SilkToSilkClearance SilkToSilkClearance_InvToFill [(ObjectKind = 'Text') And (TextKind <> 'Stroke Font') vs isFill] p1: silktosilkclearance=0
SilkToSilkClearance SilkToSilkClearance_Labels [(ObjectKind = 'Text') And (TextKind <> 'Stroke Font') vs (ObjectKind = 'Text') And (TextKind <> 'Stroke Font')] p2: silktosilkclearance=0
SilkToSilkClearance SilkToSilkClearance_Pb [(ObjectKind = 'Text') And (StringText = 'Pb') vs istrack and onsilkscreen] p3: silktosilkclearance=0
SilkToSilkClearance [All] p4: silktosilkclearance=0.127
SilkscreenOverComponentPads [All] p1: minsilkscreentomaskgap=0.051
SolderMaskExpansion SolderMaskExpansion_Vias [IsVia] p1: expansion=-0.65
SolderMaskExpansion [All] p2: expansion=0.038
Width [All] p1: maxlimit=2.5 minlimit=0.127 preferedwidth=0.127
16 further rules are at their usual default settings.

## Classes and differential pairs
component class U_DB46_Hardware_Kit: FD1 FD2 PCB1
channel class SRAM_256Kx16_TSOP44: U_SRAM_K6R4016V1D-TC10T_256Kx161 U_SRAM_K6R4016V1D-TC10T_256Kx162
component class COM_SRAM: C107 C108 C109 C110 C111 C112 C113 C114 U11 U12
component class U_FPGA: C78 C79 NT2 NT3 NT4 NT5 NT6 NT7 R3 R4 R5 R6 R7 R8 R9 R10 R11 R12 R13 R14 R15 R16 R17 U4
component class COM_SDRAM: C91 C92 C93 C94 C95 C96 C97 C98 U7 U8
component class U_CommonMemory_Termination: RN1 RN2 RN3 RN4 RN5 RN6
component class COM_FLASH: C72 C73 C74 C75 C76 C77 U3
component class U_MOUNTS: "Altium Logo Bot1" "Altium Logo Top1" LB1 LB2 LB3 MH1 MH2 MH3 PCBA1
net class PWRNET: 1V2 2V5 3V3 5V0 AGND
differential pair class DIFF_OUT: DIFF_TX0 DIFF_TX1 DIFF_TX2 DIFF_TX3
differential pair class DIFF_IN: DIFF_RX0 DIFF_RX1 DIFF_RX2 DIFF_RX3
net class SW[4..0]: SW0 SW1 SW2 SW3 SW4
net class LED[7..0]: LED0 LED1 LED2 LED3 LED4 LED5 LED6 LED7
net class IO[35..0]: IO0 IO1 IO2 IO3 IO4 IO5 IO6 IO7 IO8 IO9 IO10 IO11 IO12 IO13 IO14 IO15 IO16 IO17 IO18 IO19 IO20 IO21 IO22 IO23 IO24 IO25 IO26 IO27 IO28 IO29 IO30 IO31 IO32 IO33 IO34 IO35
net class FPGA_M[2..0]: FPGA_M0 FPGA_M1 FPGA_M2
net class FPGA_ID[3..0]: FPGA_ID0 FPGA_ID1 FPGA_ID2 FPGA_ID3
net class DIP[7..0]: DIP0 DIP1 DIP2 DIP3 DIP4 DIP5 DIP6 DIP7
net class BUS_NBE[3..0]: BUS_NBE0 BUS_NBE1 BUS_NBE2 BUS_NBE3
net class BUS_D[31..0]: BUS_D0 BUS_D1 BUS_D2 BUS_D3 BUS_D4 BUS_D5 BUS_D6 BUS_D7 BUS_D8 BUS_D9 BUS_D10 BUS_D11 BUS_D12 BUS_D13 BUS_D14 BUS_D15 BUS_D16 BUS_D17 BUS_D18 BUS_D19 BUS_D20 BUS_D21 BUS_D22 BUS_D23 BUS_D24 BUS_D25 BUS_D26 BUS_D27 BUS_D28 BUS_D29 BUS_D30 BUS_D31
component class U_MotherBoardConnectors: HDR_B1 HDR_L HDR_L1 HDR_T1 NT1
component class U_Bypass_1V2: C3 C4 C5 C6 C7 C8 C9 C10 C11 C12 C13 C14 C15 C16 C17 C18 C19 C20 C21 C22
component class U_Bypass_3V3: C32 C33 C34 C35 C36 C37 C38 C39 C40 C41 C42 C43 C44 C45 C46 C46_FP C47 C47_FP C48 C48_FP C49 C49_FP C50 C51 C51_FP C52 C52_FP C53 C54 C55 C56 C56_FP C57 C58 C58_FP C59 C59_FP C60 C60_FP C61 C61_FP C62 C63 C64 C65 C65_FP C66 C67 C68 C69_FP C71_FP C72_FP C73_FP C79_FP C81_FP C82_FP C88_FP C90_FP C91_FP C93_FP C95_FP C96_FP C97_FP C98_FP C101_FP C102_FP C103_FP C104_FP C105_FP C106_FP
component class U_Bypass_Board: C1_PSU C4_MB C6_MB C69 C70
net class DAU_TFT_BLUE[4..0]: DAU_TFT_BLUE0 DAU_TFT_BLUE1 DAU_TFT_BLUE2 DAU_TFT_BLUE3 DAU_TFT_BLUE4
net class DAU_TFT_CL[3..1]: DAU_TFT_CL1 DAU_TFT_CL2 DAU_TFT_CL3
net class DAU_TFT_GREEN[5..0]: DAU_TFT_GREEN0 DAU_TFT_GREEN1 DAU_TFT_GREEN2 DAU_TFT_GREEN3 DAU_TFT_GREEN4 DAU_TFT_GREEN5
net class DAU_TFT_RED[4..0]: DAU_TFT_RED0 DAU_TFT_RED1 DAU_TFT_RED2 DAU_TFT_RED3 DAU_TFT_RED4
net class EXTEND_A[49..0]: EXTEND_A0 EXTEND_A1 EXTEND_A2 EXTEND_A3 EXTEND_A4 EXTEND_A5 EXTEND_A6 EXTEND_A7 EXTEND_A8 EXTEND_A9 EXTEND_A10 EXTEND_A11 EXTEND_A12 EXTEND_A13 EXTEND_A14 EXTEND_A15 EXTEND_A16 EXTEND_A17 EXTEND_A18 EXTEND_A19 EXTEND_A20 EXTEND_A21 EXTEND_A22 EXTEND_A23 EXTEND_A24 EXTEND_A25 EXTEND_A26 EXTEND_A27 EXTEND_A28 EXTEND_A29 EXTEND_A30 EXTEND_A31 EXTEND_A32 EXTEND_A33 EXTEND_A34 EXTEND_A35 EXTEND_A36 EXTEND_A37 EXTEND_A38 EXTEND_A39 EXTEND_A40 EXTEND_A41 EXTEND_A42 EXTEND_A43 EXTEND_A44 EXTEND_A45 EXTEND_A46 EXTEND_A47 EXTEND_A48 EXTEND_A49
net class EXTEND_B[49..0]: EXTEND_B0 EXTEND_B1 EXTEND_B2 EXTEND_B3 EXTEND_B4 EXTEND_B5 EXTEND_B6 EXTEND_B7 EXTEND_B8 EXTEND_B9 EXTEND_B10 EXTEND_B11 EXTEND_B12 EXTEND_B13 EXTEND_B14 EXTEND_B15 EXTEND_B16 EXTEND_B17 EXTEND_B18 EXTEND_B19 EXTEND_B20 EXTEND_B21 EXTEND_B22 EXTEND_B23 EXTEND_B24 EXTEND_B25 EXTEND_B26 EXTEND_B27 EXTEND_B28 EXTEND_B29 EXTEND_B30 EXTEND_B31 EXTEND_B32 EXTEND_B33 EXTEND_B34 EXTEND_B35 EXTEND_B36 EXTEND_B37 EXTEND_B38 EXTEND_B39 EXTEND_B40 EXTEND_B41 EXTEND_B42 EXTEND_B43 EXTEND_B44 EXTEND_B45 EXTEND_B46 EXTEND_B47 EXTEND_B48 EXTEND_B49
net class EXTEND_C[49..0]: EXTEND_C0 EXTEND_C1 EXTEND_C2 EXTEND_C3 EXTEND_C4 EXTEND_C5 EXTEND_C6 EXTEND_C7 EXTEND_C8 EXTEND_C9 EXTEND_C10 EXTEND_C11 EXTEND_C12 EXTEND_C13 EXTEND_C14 EXTEND_C15 EXTEND_C16 EXTEND_C17 EXTEND_C18 EXTEND_C19 EXTEND_C20 EXTEND_C21 EXTEND_C22 EXTEND_C23 EXTEND_C24 EXTEND_C25 EXTEND_C26 EXTEND_C27 EXTEND_C28 EXTEND_C29 EXTEND_C30 EXTEND_C31 EXTEND_C32 EXTEND_C33 EXTEND_C34 EXTEND_C35 EXTEND_C36 EXTEND_C37 EXTEND_C38 EXTEND_C39 EXTEND_C40 EXTEND_C41 EXTEND_C42 EXTEND_C43 EXTEND_C44 EXTEND_C45 EXTEND_C46 EXTEND_C47 EXTEND_C48 EXTEND_C49
net class SRAM1_A[18..0]: SRAM1_A0 SRAM1_A1 SRAM1_A2 SRAM1_A3 SRAM1_A4 SRAM1_A5 SRAM1_A6 SRAM1_A7 SRAM1_A8 SRAM1_A9 SRAM1_A10 SRAM1_A11 SRAM1_A12 SRAM1_A13 SRAM1_A14 SRAM1_A15 SRAM1_A16 SRAM1_A17 SRAM1_A18
net class SRAM1_D[15..0]: SRAM1_D0 SRAM1_D1 SRAM1_D2 SRAM1_D3 SRAM1_D4 SRAM1_D5 SRAM1_D6 SRAM1_D7 SRAM1_D8 SRAM1_D9 SRAM1_D10 SRAM1_D11 SRAM1_D12 SRAM1_D13 SRAM1_D14 SRAM1_D15
net class SRAM2_A[18..0]: SRAM2_A0 SRAM2_A1 SRAM2_A2 SRAM2_A3 SRAM2_A4 SRAM2_A5 SRAM2_A6 SRAM2_A7 SRAM2_A8 SRAM2_A9 SRAM2_A10 SRAM2_A11 SRAM2_A12 SRAM2_A13 SRAM2_A14 SRAM2_A15 SRAM2_A16 SRAM2_A17 SRAM2_A18
component class U_1WB_DS2406_EPROM: C1 C2 U1
component class U_DaughterBoard_LEDS: C71 LED1 LED2 R1 R2 U2
component class U_SRAM_K6R4016V1D-TC10T_256Kx161: C99 C100 C101 C102 U9
component class U_SRAM_K6R4016V1D-TC10T_256Kx162: C1_SM C2_SM C4_SM C103 C104 C105 C106 U1_SM U10
component class U_PSU_MAX1831_1V2_ALT: C80 C81 C82 C83 C84 C85 C86 C87 L1 R23 R24 R25 R26 R27 TP7 TP8 U5
component class U_Bypass_2V5: C20_FP C23 C24 C24_FP C25 C25_FP C26 C27 C27_FP C28 C29 C30 C30_FP C31 C31_FP C32_FP C33_FP C34_FP C37_FP
net class BUS_A[24..1]: BUS_A1 BUS_A2 BUS_A3 BUS_A4 BUS_A5 BUS_A6 BUS_A7 BUS_A8 BUS_A9 BUS_A10 BUS_A11 BUS_A12 BUS_A13 BUS_A14 BUS_A15 BUS_A16 BUS_A17 BUS_A18 BUS_A19 BUS_A20 BUS_A21 BUS_A22 BUS_A23 BUS_A24
net class SRAM2_D[15..0]: SRAM2_D0 SRAM2_D1 SRAM2_D2 SRAM2_D3 SRAM2_D4 SRAM2_D5 SRAM2_D6 SRAM2_D7 SRAM2_D8 SRAM2_D9 SRAM2_D10 SRAM2_D11 SRAM2_D12 SRAM2_D13 SRAM2_D14 SRAM2_D15
component class U_PSU_MAX8860_ADJ: C88 C89 C90 R28 R29 U6
component class U_PSU: NT8 R22 TP1 TP2 TP3 TP4 TP5

## Components (designator, comment, footprint, x,y, rotation, side; value= is the part's Value field where it differs from the comment)
"Altium Logo Bot1" "Altium" Logo-Altium 55.3,3.3 r180 bottom
"Altium Logo Top1" "Altium" Logo-Altium 26.7,3.3 r0 top
C1 "0.1uF 16V" CAPC1005-STAR 71.3,76.6 r180 bottom
C2 "10nF 16V" CAPC1005-STAR 71.3,75.4 r0 bottom
C3 "220uF 10V" CAPC7343-STAR 63.3,39.4 r0 bottom (schematic designator C5_MB)
C4 "10uF 10V" CAPC2012-STAR 22.6,39.4 r90 bottom (schematic designator C1_FP)
C5 "10uF 10V" CAPC2012-STAR 54.701,35.4 r270 bottom (schematic designator C2_FP)
C6 "10uF 10V" CAPC2012-STAR 54.7,39.4 r90 bottom (schematic designator C3_FP)
C7 "0.1uF 16V" CAPC1005-STAR 43,33.4 r0 bottom (schematic designator C4_FP)
C8 "0.1uF 16V" CAPC1005-STAR 41.7,35.7 r90 bottom (schematic designator C5_FP)
C9 "0.1uF 16V" CAPC1005-STAR 38,36.2 r0 bottom (schematic designator C6_FP)
C10 "0.1uF 16V" CAPC1005-STAR 39.4,38.6 r180 bottom (schematic designator C7_FP)
C11 "0.1uF 16V" CAPC1005-STAR 37.2,34.4 r0 bottom (schematic designator C8_FP)
C12 "0.1uF 16V" CAPC1005-STAR 40.4,41.4 r180 bottom (schematic designator C9_FP)
C13 "0.1uF 16V" CAPC1005-STAR 37.5,38.1 r270 bottom (schematic designator C10_FP)
C14 "0.1uF 16V" CAPC1005-STAR 35.7,39.1 r270 bottom (schematic designator C11_FP)
C15 "10nF 16V" CAPC1005-STAR 39.9,36.7 r90 bottom (schematic designator C12_FP)
C16 "10nF 16V" CAPC1005-STAR 42.7,35.7 r90 bottom (schematic designator C13_FP)
C17 "10nF 16V" CAPC1005-STAR 42.2,39.6 r180 bottom (schematic designator C14_FP)
C18 "10nF 16V" CAPC1005-STAR 36.6,40.9 r270 bottom (schematic designator C15_FP)
C19 "10nF 16V" CAPC1005-STAR 34.7,35.7 r90 bottom (schematic designator C16_FP)
C20 "10nF 16V" CAPC1005-STAR 35.7,35.7 r90 bottom (schematic designator C17_FP)
C21 "10nF 16V" CAPC1005-STAR 40.4,40.4 r180 bottom (schematic designator C18_FP)
C22 "10nF 16V" CAPC1005-STAR 34.7,39.1 r270 bottom (schematic designator C19_FP)
C23 "220uF 10V" CAPC7343-STAR 45.3,79.8 r180 bottom (schematic designator C3_MB)
C24 "10uF 10V" CAPC2012-STAR 39.7,23.2 r180 bottom (schematic designator C21_FP)
C25 "0.1uF 16V" CAPC1005-STAR 40.4,42.4 r180 bottom (schematic designator C22_FP)
C26 "0.1uF 16V" CAPC1005-STAR 42.7,37.8 r270 bottom (schematic designator C23_FP)
C27 "0.1uF 16V" CAPC1005-STAR 40.5,32.9 r90 bottom (schematic designator C26_FP)
C28 "10nF 16V" CAPC1005-STAR 37.7,41.9 r270 bottom (schematic designator C28_FP)
C29 "10nF 16V" CAPC1005-STAR 33.7,39.8 r90 bottom (schematic designator C29_FP)
C30 "10nF 16V" CAPC1005-STAR 43.7,34.8 r270 bottom (schematic designator C35_FP)
C31 "10nF 16V" CAPC1005-STAR 36.1,32.3 r0 bottom (schematic designator C36_FP)
C32 "10uF 10V" CAPC2012-STAR 31.5,53.5 r0 bottom (schematic designator C38_FP)
C33 "10uF 10V" CAPC2012-STAR 22.6,43.6 r270 bottom (schematic designator C39_FP)
C34 "10uF 10V" CAPC2012-STAR 45.903,53.474 r180 bottom (schematic designator C40_FP)
C35 "10uF 10V" CAPC2012-STAR 22.6,30.2 r90 bottom (schematic designator C41_FP)
C36 "10uF 10V" CAPC2012-STAR 54.7,43.4 r270 bottom (schematic designator C42_FP)
C37 "10uF 10V" CAPC2012-STAR 54.8,30.1 r90 bottom (schematic designator C43_FP)
C38 "10uF 10V" CAPC2012-STAR 45,21.3 r180 bottom (schematic designator C44_FP)
C39 "10uF 10V" CAPC2012-STAR 31.4,21.3 r0 bottom (schematic designator C45_FP)
C40 "0.1uF 16V" CAPC1005-STAR 32.7,32.1 r270 bottom (schematic designator C50_FP)
C41 "0.1uF 16V" CAPC1005-STAR 44.2,42.65 r180 bottom (schematic designator C53_FP)
C42 "0.1uF 16V" CAPC1005-STAR 26.2,39.65 r180 bottom (schematic designator C54_FP)
C43 "0.1uF 16V" CAPC1005-STAR 43.4,49.4 r180 bottom (schematic designator C55_FP)
C44 "0.1uF 16V" CAPC1005-STAR 26.699,46.9 r90 bottom (schematic designator C57_FP)
C45 "10nF 16V" CAPC1005-STAR 49.2,25.399 r0 bottom (schematic designator C62_FP)
C46 "10nF 16V" CAPC1005-STAR 64.451,70.401 r90 bottom (schematic designator C63_FP)
C47 "10nF 16V" CAPC1005-STAR 34.4,49.4 r180 bottom (schematic designator C64_FP)
C48 "10nF 16V" CAPC1005-STAR 49.2,49.4 r0 bottom (schematic designator C66_FP)
C49 "10nF 16V" CAPC1005-STAR 34.7,24.899 r90 bottom (schematic designator C67_FP)
C50 "10nF 16V" CAPC1005-STAR 42.5,42.1 r270 bottom (schematic designator C68_FP)
C51 "10nF 16V" CAPC1005-STAR 40.4,49.4 r180 bottom (schematic designator C70_FP)
C52 "10nF 16V" CAPC1005-STAR 43.9,40.7 r270 bottom (schematic designator C74_FP)
C53 "10nF 16V" CAPC1005-STAR 34,41.4 r0 bottom (schematic designator C75_FP)
C54 "10nF 16V" CAPC1005-STAR 31.95,50.4 r90 bottom (schematic designator C76_FP)
C55 "10nF 16V" CAPC1005-STAR 26.199,38.15 r0 bottom (schematic designator C77_FP)
C56 "10nF 16V" CAPC1005-STAR 34.5,32 r90 bottom (schematic designator C78_FP)
C57 "10nF 16V" CAPC1005-STAR 26.699,30.9 r90 bottom (schematic designator C80_FP)
C58 "10nF 16V" CAPC1005-STAR 41.9,31.9 r90 bottom (schematic designator C83_FP)
C59 "10nF 16V" CAPC1005-STAR 33.7,33 r270 bottom (schematic designator C84_FP)
C60 "10nF 16V" CAPC1005-STAR 52.701,37.4 r0 bottom (schematic designator C85_FP)
C61 "10nF 16V" CAPC1005-STAR 38.2,43.3 r180 bottom (schematic designator C86_FP)
C62 "10nF 16V" CAPC1005-STAR 50.701,30.9 r90 bottom (schematic designator C87_FP)
C63 "10nF 16V" CAPC1005-STAR 35.5,42.9 r270 bottom (schematic designator C89_FP)
C64 "10nF 16V" CAPC1005-STAR 50.7,33.1 r270 bottom (schematic designator C92_FP)
C65 "10nF 16V" CAPC1005-STAR 44.2,32.6 r180 bottom (schematic designator C94_FP)
C66 "10nF 16V" CAPC1005-STAR 33.7,35.7 r90 bottom (schematic designator C96_FP)
C67 "10nF 16V" CAPC1005-STAR 38.2,32.6 r0 bottom (schematic designator C99_FP)
C68 "10nF 16V" CAPC1005-STAR 28.199,49.4 r180 bottom (schematic designator C100_FP)
C69 "220uF 10V" CAPC7343-STAR 20.4,84.1 r180 bottom (schematic designator C1_MB)
C70 "220uF 10V" CAPC7343-STAR 47.5,72.7 r180 bottom (schematic designator C2_MB)
C71 "0.1uF 16V" CAPC1005-STAR 32,6 r0 bottom (schematic designator C1_SL)
C72 "0.1uF 16V" CAPC1005-STAR 60.2,71.1 r180 bottom (schematic designator C1)
C73 "0.1uF 16V" CAPC1005-STAR 57.5,82.125 r180 bottom (schematic designator C2)
C74 "10nF 16V" CAPC1005-STAR 55.4,75.4 r270 bottom (schematic designator C3)
C75 "10nF 16V" CAPC1005-STAR 60.2,72.1 r180 bottom (schematic designator C4)
C76 "10nF 16V" CAPC1005-STAR 57.5,80.925 r180 bottom (schematic designator C5)
C77 "0.1uF 16V" CAPC1005-STAR 54.4,75.4 r270 bottom (schematic designator C6)
C78 "10uF 10V" CAPC2012-STAR 70.25,78.425 r0 bottom (schematic designator C23_CM)
C79 "10uF 10V" CAPC2012-STAR 56.3,101.25 r270 bottom (schematic designator C24_CM)
C80 "470pF 50V" CAPC1005-STAR 74.8,44.2 r90 top (schematic designator C2_PS)
C81 "2.2uF 10V" CAPC1608-STAR 62.4,43 r180 top (schematic designator C4_PS)
C82 "220uF 10V" CAPC7343-STAR 71.5,54.6 r180 top (schematic designator C3_PS)
C83 "10uF 10V" CAPC2012-STAR 75.9,36.2 r270 top (schematic designator C5_PS)
C84 "22uF 10V" CAPC3225-STAR 69.8,38.2 r180 top (schematic designator C6_PS)
C85 "10uF 10V" CAPC2012-STAR 79.2,45.6 r270 top (schematic designator C8_PS)
C86 "22uF 10V" CAPC3225-STAR 67,50.2 r180 top (schematic designator C1_PS)
C87 "1uF 25V" CAPC3216-STAR 62.2,45.3 r0 top (schematic designator C7_PS)
C88 "2.2uF 10V" CAPC1608-STAR 39.3,73 r180 bottom (schematic designator C3_LD)
C89 "2.2uF 10V" CAPC1608-STAR 33.7,75.3 r270 bottom (schematic designator C1_LD)
C90 "0.033uF 10V" CAPC1005-STAR 34.3,72.8 r270 bottom (schematic designator C2_LD)
C91 "0.1uF 16V" CAPC1005-STAR 54.6,101.8 r270 top (schematic designator C1)
C92 "0.1uF 16V" CAPC1005-STAR 39,85.7 r180 top (schematic designator C2)
C93 "0.1uF 16V" CAPC1005-STAR 32.5,86.5 r180 bottom (schematic designator C3)
C94 "0.1uF 16V" CAPC1005-STAR 45.8,101.6 r90 bottom (schematic designator C4)
C95 "10nF 16V" CAPC1005-STAR 36.6,101.1 r180 top (schematic designator C5)
C96 "10nF 16V" CAPC1005-STAR 41.4,101.1 r180 top (schematic designator C6)
C97 "10nF 16V" CAPC1005-STAR 51.8,85.7 r180 bottom (schematic designator C7)
C98 "10nF 16V" CAPC1005-STAR 47,85.7 r180 bottom (schematic designator C8)
C99 "0.1uF 16V" CAPC1005-STAR 74.052,26.9 r90 top (schematic designator C1_SM)
C100 "0.1uF 16V" CAPC1005-STAR 58.652,26.8 r270 top (schematic designator C2_SM)
C101 "10nF 16V" CAPC1005-STAR 74.052,24.9 r270 top (schematic designator C3_SM)
C102 "10nF 16V" CAPC1005-STAR 57.4,26.8 r270 top (schematic designator C4_SM)
C103 "0.1uF 16V" CAPC1005-STAR 60.752,24.9 r270 bottom (schematic designator C1_SM)
C104 "0.1uF 16V" CAPC1005-STAR 76.4,28.8 r90 bottom (schematic designator C2_SM)
C105 "10nF 16V" CAPC1005-STAR 60.752,27 r90 bottom (schematic designator C3_SM)
C106 "10nF 16V" CAPC1005-STAR 76.4,26.8 r270 bottom (schematic designator C4_SM)
C107 "0.1uF 16V" CAPC1005-STAR 66.143,84.5 r0 top (schematic designator C1)
C108 "0.1uF 16V" CAPC1005-STAR 66.1,102.3 r180 top (schematic designator C2)
C109 "0.1uF 16V" CAPC1005-STAR 66.1,84.6 r0 bottom (schematic designator C3)
C110 "0.1uF 16V" CAPC1005-STAR 67.7,102.3 r0 bottom (schematic designator C4)
C111 "10nF 16V" CAPC1005-STAR 66.143,85.6 r0 top (schematic designator C5)
C112 "10nF 16V" CAPC1005-STAR 66.093,101.2 r180 top (schematic designator C6)
C113 "10nF 16V" CAPC1005-STAR 66.1,85.6 r0 bottom (schematic designator C7)
C114 "10nF 16V" CAPC1005-STAR 67.7,101.2 r0 bottom (schematic designator C8)
FD1 "Fiducial - Round" "FIDUCIAL ROUND" 78.004,93.005 r0 top
FD2 "Fiducial - Round" "FIDUCIAL ROUND" 15.001,13.501 r0 top
HDR_B1 "MOLEX - 54075-1009" 54075 48.1,12 r0 bottom locked (schematic designator HDR_B)
HDR_L1 "MOLEX - 54075-1009" 54075 7.8,37.4 r270 bottom locked (schematic designator HDR_L)
HDR_T1 "MOLEX - 54075-1009" 54075 48.1,62.8 r0 bottom locked (schematic designator HDR_T)
L1 "2u2, 15A, 4R2, SMD" IND-EPCOS-SMD-B82559 74.8,41.9 r90 bottom (schematic designator L1_PS)
LED1 "GREEN" LED2012-STAR 32.05,4.3 r180 top (schematic designator LED2_SL)
LED2 "RED" LED2012-STAR 50.15,4.3 r180 top (schematic designator LED1_SL)
MH1 "MOUNTING HOLE 3MM" MOUNTING_HOLE_3MM 41.1,3.3 r180 top
MH2 "MOUNTING HOLE 3MM" MOUNTING_HOLE_3MM 3.3,109.9 r180 top
MH3 "MOUNTING HOLE 3MM" MOUNTING_HOLE_3MM 78.9,109.9 r180 top
NT1 "Net Tie SMT2" NETTIE-SMT2-8X8 41.306,68.591 r90 bottom net-tie
NT2 "Net Tie SMT2" NETTIE-SMT2-8X8 37.191,6.569 r0 bottom net-tie (schematic designator NT6)
NT3 "Net Tie SMT2" NETTIE-SMT2-8X8 44.506,68.091 r90 bottom net-tie (schematic designator NT2)
NT4 "Net Tie SMT2" NETTIE-SMT2-8X8 39.394,54.991 r90 top net-tie (schematic designator NT8)
NT5 "Net Tie SMT2" NETTIE-SMT2-8X8 43.706,68.091 r90 bottom net-tie (schematic designator NT3)
NT6 "Net Tie SMT2" NETTIE-SMT2-8X8 42.906,68.091 r90 bottom net-tie (schematic designator NT4)
NT7 "Net Tie SMT2" NETTIE-SMT2-8X8 42.106,68.091 r90 bottom net-tie (schematic designator NT5)
NT8 "Net Tie SMT2" NETTIE-SMT2-8X8 63.994,50.364 r90 top net-tie (schematic designator NT7)
PBFREE "" LEAD_FREE_S 78,73.4 r180 bottom
PBFREE1 "" LEAD_FREE_S 14.7,101.7 r180 bottom
PCB1 "DB46 Blank PCB" "DB46 Blank PCB" 82.1,2.32 r90 top
R1 "270R 1%" RESC1005-STAR 31.7,4.3 r180 bottom (schematic designator R2_SL)
R2 "270R 1%" RESC1005-STAR 50.15,4.3 r180 bottom (schematic designator R1_SL)
R3 "4K7 1%" RESC1005-STAR 22,54.5 r180 bottom (schematic designator R1)
R4 "100R 1%" RESC1005-STAR 25,54.5 r0 bottom (schematic designator R7)
R5 "4K7 1%" RESC1005-STAR 54.1,53.5 r90 bottom (schematic designator R2)
R6 "100R 1%" RESC1005-STAR 50,53.5 r270 bottom (schematic designator R8)
R7 "100R 1%" RESC1005-STAR 52,53.5 r270 bottom (schematic designator R9)
R8 "4K7 1%" RESC1005-STAR 47.2,76.2 r180 bottom (schematic designator R3)
R9 "100R 1%" RESC1005-STAR 54.1,51.4 r270 bottom (schematic designator R10)
R10 "100R 1%" RESC1005-STAR 25,53.2 r180 bottom (schematic designator R12)
R11 "4K7 1%" RESC1005-STAR 55,23.6 r180 bottom (schematic designator R4)
R12 "100R 1%" RESC1005-STAR 22.5,23.5 r0 bottom (schematic designator R14)
R13 "100R 1%" RESC1005-STAR 22.5,24.6 r0 bottom (schematic designator R18)
R14 "100R 1%" RESC1005-STAR 22.5,22.4 r0 bottom (schematic designator R23)
R15 "100R 1%" RESC1005-STAR 22,53.2 r180 bottom (schematic designator R24)
R16 "100R 1%" RESC1005-STAR 52.451,42.4 r270 bottom (schematic designator R22)
R17 "100R 1%" RESC1005-STAR 52.451,40.15 r270 bottom (schematic designator R20)
R22 "100K 1%" RESC1005-STAR 36.9,72.8 r270 bottom (schematic designator R1T)
R23 "10R 1%" RESC1005-STAR 63.3,41.2 r90 top (schematic designator R2_PS)
R24 "2K7 1%" RESC1005-STAR 70.8,47.4 r0 top (schematic designator R1_PS)
R25 "27K 1%" RESC1005-STAR 73.4,47.4 r0 top (schematic designator R3_PS)
R26 "2K7 1%" RESC1005-STAR 76,47.4 r0 top (schematic designator R4_PS)
R27 "100K 1%" RESC1005-STAR 76,46.1 r0 top (schematic designator R5_PS)
R28 "100K 1%" RESC1005-STAR 37.9,77.6 r180 bottom (schematic designator R1_LD)
R29 "100K 1%" RESC1005-STAR 35.6,72.8 r270 bottom (schematic designator R2_LD)
RN1 "RESNET 4 x 100R" RESNET-1005X4 42.24,83.85 r90 bottom (schematic designator RN33)
RN2 "RESNET 4 x 100R" RESNET-1005X4 34.715,83.85 r90 bottom (schematic designator RN35)
RN3 "RESNET 4 x 100R" RESNET-1005X4 39.615,102.25 r90 bottom (schematic designator RN37)
RN4 "RESNET 4 x 100R" RESNET-1005X4 45.9,83.9 r270 bottom (schematic designator RN34)
RN5 "RESNET 4 x 100R" RESNET-1005X4 43.215,102.25 r270 bottom (schematic designator RN38)
RN6 "RESNET 4 x 100R" RESNET-1005X4 38.315,83.85 r270 bottom (schematic designator RN36)
TP1 "GND" TestPin 73.043,79.722 r0 top (schematic designator TP0)
TP2 "3V3" TestPin 73.043,77.182 r0 top (schematic designator TP1)
TP3 "2V5" TestPin 73.043,74.642 r0 top (schematic designator TP2)
TP4 "5V0" TestPin 73.043,72.102 r0 top (schematic designator TP3)
TP5 "1V2" TestPin 73.043,69.562 r0 top (schematic designator TP4)
U1 "DS2406" TSOC6 68.9,72.3 r90 bottom
U2 "SN74LVC1G04DBV" SOT95P280-5 35.5,4.2 r0 bottom (schematic designator U1_SL)
U3 "S29GL256N11FFIV10" BGA100P8X8-64 60.2,77.125 r180 top locked (schematic designator U1)
U4 "XC4VSX35-10FFG668C" XC4VLX25-10FF668C 38.7,37.4 r0 top locked (schematic designator U1)
U5 "MAX1831EEE" SOP63P602-16 68.798,43.707 r180 top locked (schematic designator U1_PS)
U6 "MAX8860EUA18+" SOP65P490-8 37.9,75.4 r180 bottom (schematic designator U11)
U7 "SDRAM-16Mx16" TSOP80P1176-54 44.2,93.4 r0 top (schematic designator U1)
U8 "SDRAM-16Mx16" TSOP80P1176-54 44.2,93.4 r180 bottom (schematic designator U2)
U9 "SRAM-256Kx16" TSOP80P1176-44 66.352,26.9 r90 top (schematic designator U1_SM)
U10 "SRAM-256Kx16" TSOP80P1176-44 68.652,26.9 r90 bottom (schematic designator U1_SM)
U11 "SRAM-256Kx16" TSOP80P1176-44 66.1,93.4 r0 top (schematic designator U1)
U12 "SRAM-256Kx16" TSOP80P1176-44 67.7,93.4 r180 bottom (schematic designator U2)

## Footprints (in the part's own frame and the unit in brackets; to place one, negate y for a bottom-side part, rotate by r counter-clockwise, add the part's x,y. Pads: shape width x height; smd on the part's side, far side on the other; paste and mask are expansions set on the pad)
54075 [mm]
  rect 0.5x1.9 smd: 1(-19.6,3.4) 2(-19.6,-3.4) 3(-18.8,3.4) 4(-18.8,-3.4) 5(-18,3.4) 6(-18,-3.4) 7(-17.2,3.4) 8(-17.2,-3.4) 9(-16.4,3.4) 10(-16.4,-3.4) 11(-15.6,3.4) 12(-15.6,-3.4) 13(-14.8,3.4) 14(-14.8,-3.4) 15(-14,3.4) 16(-14,-3.4) 17(-13.2,3.4) 18(-13.2,-3.4) 19(-12.4,3.4) 20(-12.4,-3.4) 21(-11.6,3.4) 22(-11.6,-3.4) 23(-10.8,3.4) 24(-10.8,-3.4) 25(-10,3.4) 26(-10,-3.4) 27(-9.2,3.4) 28(-9.2,-3.4) 29(-8.4,3.4) 30(-8.4,-3.4) 31(-7.6,3.4) 32(-7.6,-3.4) 33(-6.8,3.4) 34(-6.8,-3.4) 35(-6,3.4) 36(-6,-3.4) 37(-5.2,3.4) 38(-5.2,-3.4) 39(-4.4,3.4) 40(-4.4,-3.4) 41(-3.6,3.4) 42(-3.6,-3.4) 43(-2.8,3.4) 44(-2.8,-3.4) 45(-2,3.4) 46(-2,-3.4) 47(-1.2,3.4) 48(-1.2,-3.4) 49(-0.4,3.4) 50(-0.4,-3.4) 51(0.4,3.4) 52(0.4,-3.4) 53(1.2,3.4) 54(1.2,-3.4) 55(2,3.4) 56(2,-3.4) 57(2.8,3.4) 58(2.8,-3.4) 59(3.6,3.4) 60(3.6,-3.4) 61(4.4,3.4) 62(4.4,-3.4) 63(5.2,3.4) 64(5.2,-3.4) 65(6,3.4) 66(6,-3.4) 67(6.8,3.4) 68(6.8,-3.4) 69(7.6,3.4) 70(7.6,-3.4) 71(8.4,3.4) 72(8.4,-3.4) 73(9.2,3.4) 74(9.2,-3.4) 75(10,3.4) 76(10,-3.4) 77(10.8,3.4) 78(10.8,-3.4) 79(11.6,3.4) 80(11.6,-3.4) 81(12.4,3.4) 82(12.4,-3.4) 83(13.2,3.4) 84(13.2,-3.4) 85(14,3.4) 86(14,-3.4) 87(14.8,3.4) 88(14.8,-3.4) 89(15.6,3.4) 90(15.6,-3.4) 91(16.4,3.4) 92(16.4,-3.4) 93(17.2,3.4) 94(17.2,-3.4) 95(18,3.4) 96(18,-3.4) 97(18.8,3.4) 98(18.8,-3.4) 99(19.6,3.4) 100(19.6,-3.4)
  round 1.6 hole 0.7: MH1(-26.7,4.2) MH2(-25.9,-4.2) MH3(26.7,4.2) MH4(25.9,-4.2)
  round 4.8 hole 5.1 unplated: MH5(-26.3,0) MH6(26.3,0)
  Top Layer keep-out region: -20.15,2.15 20.15,2.15 20.15,-2.15 -20.15,-2.15
  silkscreen extent -30.35,-4.4 30.35,5.02, body extent -30.36,-4.42 30.34,4.38, height 3.75
BGA100P8X8-64 [mm] "AMD 64-Ball Fortfied Ball grid Array (FBGA)"
  round 0.5 smd: A1(-3.5,-3.5) A2(-3.5,-2.5) A3(-3.5,-1.5) A4(-3.5,-0.5) A5(-3.5,0.5) A6(-3.5,1.5) A7(-3.5,2.5) A8(-3.5,3.5) B1(-2.5,-3.5) B2(-2.5,-2.5) B3(-2.5,-1.5) B4(-2.5,-0.5) B5(-2.5,0.5) B6(-2.5,1.5) B7(-2.5,2.5) B8(-2.5,3.5) C1(-1.5,-3.5) C2(-1.5,-2.5) C3(-1.5,-1.5) C4(-1.5,-0.5) C5(-1.5,0.5) C6(-1.5,1.5) C7(-1.5,2.5) C8(-1.5,3.5) D1(-0.5,-3.5) D2(-0.5,-2.5) D3(-0.5,-1.5) D4(-0.5,-0.5) D5(-0.5,0.5) D6(-0.5,1.5) D7(-0.5,2.5) D8(-0.5,3.5) E1(0.5,-3.5) E2(0.5,-2.5) E3(0.5,-1.5) E4(0.5,-0.5) E5(0.5,0.5) E6(0.5,1.5) E7(0.5,2.5) E8(0.5,3.5) F1(1.5,-3.5) F2(1.5,-2.5) F3(1.5,-1.5) F4(1.5,-0.5) F5(1.5,0.5) F6(1.5,1.5) F7(1.5,2.5) F8(1.5,3.5) G1(2.5,-3.5) G2(2.5,-2.5) G3(2.5,-1.5) G4(2.5,-0.5) G5(2.5,0.5) G6(2.5,1.5) G7(2.5,2.5) G8(2.5,3.5) H1(3.5,-3.5) H2(3.5,-2.5) H3(3.5,-1.5) H4(3.5,-0.5) H5(3.5,0.5) H6(3.5,1.5) H7(3.5,2.5) H8(3.5,3.5)
  silkscreen extent -6.5,-6.32 6.5,5.5, body extent -6.35,-5.4 6.41,5.36, height 1
CAPC1005-STAR [mm] "Chip Capacitor 1005"
  rect 0.6x0.6 smd: 1(-0.525,0) 2(0.525,0)
  silkscreen extent -0.05,-0.38 0.05,0.38, body extent -0.57,-0.3 0.57,0.3, height 0.2
CAPC1608-STAR [mm] "Capacitor SMD 0603 (1608)"
  rect 0.9x0.8 smd: 1(-0.8,0) 2(0.8,0)
  silkscreen extent 0,-0.4 0,0.4, body extent -1.11,-0.41 1.1,0.39, height 0.8
CAPC2012-STAR [mm] "0805 Capacitor SMD - Startronics"
  rect 1x1.25 smd: 1(-1,0) 2(1,0)
  silkscreen extent -0.4,-1 0.4,1, body extent -1.32,-0.69 1.23,0.67, height 0.5
CAPC3216-STAR [mm] "Capacitor 1206 (3216) for Startronics"
  rect 1x1.6 smd: 1(-1.45,0) 2(1.45,0)
  silkscreen extent -0.62,-1.1 0.62,1.1, body extent -1.64,-0.89 1.63,0.86, height 0.9
CAPC3225-STAR [mm] "1210 Capacitor SMD - Startronics"
  rect 1x2.75 smd: 1(-1.5,0) 2(1.5,0)
  silkscreen extent -0.7,-1.5 0.7,1.5, body extent -1.94,-1.2 1.89,1.29, height 1.5
CAPC7343-STAR [mm] "Capcacitor SMD 7.3 x 4.3mm (D-Case)"
  rect 2.6x2.4 smd: 1(-3.202,0.007) 2(3.198,0.007)
  silkscreen extent -5.32,-2.39 5.08,2.41, body extent -3.49,-2.03 3.51,2.04, height 4.05
"DB46 Blank PCB" [mm]
"FIDUCIAL ROUND" [mm] "FIDUCIAL ROUND"
  round 1.5 all layers, no hole paste+0 mask+1.1: 0(0,0)
  Top Layer circle w0.127: c0,0 r1.778
  Bottom Layer circle w0.127: c0,0 r1.778
  Keep-Out Layer circle w0.1: c0,0 r1.9
IND-EPCOS-SMD-B82559 [mm]
  rect 4.4x10.4 smd: 1(0,0) 2(8.4,0)
  silkscreen extent -2.5,-5.5 11,5.5, body extent -2.55,-5.3 10.9,5.6, height 4.95
LEAD_FREE_S [mm]
  silkscreen extent -3.17,-3.17 3.17,3.17
LED2012-STAR [mm] "0805 LED SMD - Startronics"
  rect 1x1.25 smd: 1(1,0) 2(-1,0)
  silkscreen extent -2.27,-1 1.8,1, body extent -1.6,-0.6 1.5,0.6, height 0.67
Logo-Altium [mm]
  silkscreen extent -26.04,-2.51 -14.12,2.59
MOUNTING_HOLE_3MM [mm] "Non-plated mounting hole for 3mm screw"
  round 3.8 hole 3.4 mask+0.2: MOUNT(0,0)
  Top Layer circle w1: c0,0 r2.3
  Top Layer region: -2.8,-2.8 2.8,-2.8 2.8,2.8 -2.8,2.8
  Top Layer keep-out region: -3.3,-3.3 3.3,-3.3 3.3,3.3 -3.3,3.3
  Bottom Layer region: -2.8,-2.8 2.8,-2.8 2.8,2.8 -2.8,2.8
  Bottom Layer keep-out region: -3.3,-3.3 3.3,-3.3 3.3,3.3 -3.3,3.3
  Keep-Out Layer circle w1.2: c0,0 r2.5
NETTIE-SMT2-8X8 [mm]
  rect 0.4x0.2 smd paste-0.11 mask-0.11: 1(-0.891,-0.006) 2(-0.691,-0.006)
RESC1005-STAR [mm] "Chip Inductor 1005"
  rect 0.575x0.6 smd: 1(-0.538,0) 2(0.538,0)
  silkscreen extent -0.05,-0.38 0.05,0.38, body extent -0.71,-0.25 0.72,0.26, height 0.25
RESNET-1005X4 [mm] "Resistor network 4 x 1005 (0402)"
  rect 0.3x0.83 smd: 1(-0.75,-0.64) 2(-0.25,-0.64) 3(0.25,-0.64) 4(0.75,-0.64) 5(0.75,0.64) 6(0.25,0.64) 7(-0.25,0.64) 8(-0.75,0.64)
  silkscreen extent -1.15,-1 1.15,1, body extent -0.92,-0.84 1.04,0.81, height 0.4
SOP63P602-16 [mil]
  rect 82x16 smd: 1(-116,87.5) 2(-116,62) 3(-116,37.5) 4(-116,12.5) 5(-116,-12.5) 6(-116,-37.5) 7(-116,-62.5) 8(-116,-87.5) 9(116,-87.5) 10(116,-62.5) 11(116,-37.5) 12(116,-12.5) 13(116,12.5) 14(116,37.5) 15(116,62.5) 16(116,87.5)
  silkscreen extent -100,-100 60,125, body extent -107,-100 108,103, height 29
SOP65P490-8 [mm]
  rect 1.5x0.35 smd: 1(-2.275,0.975) 2(-2.3,0.325) 3(-2.3,-0.325) 4(-2.3,-0.975) 5(2.275,-0.975) 6(2.275,-0.325) 7(2.3,0.325) 8(2.3,0.975)
  silkscreen extent -2.38,-1.3 1.3,1.75, body extent -2.39,-1.23 2.41,1.28, height 1
SOT95P280-5 [mm] "SOT-23/SC-74A; 5 Leads; Body 3.1 x 3 mm, inc. leads (LxW max)"
  rect 0.6x1.3 smd: 1(-0.95,-1.4) 2(0,-1.4) 3(0.95,-1.4) 4(0.95,1.4)
  rect 0.6x1.25 smd: 5(-0.95,1.4)
  silkscreen extent -1.55,-0.9 1.55,0.9, body extent -1.51,-1.49 1.52,1.52, height 0.8
TestPin [mil]
  round 60 hole 35.43: 1(0,0)
  silkscreen extent -41,-39 156,39
TSOC6 [mil]
  rect 25x71 smd: 1(-50,-75) 2(0,-75) 3(50,-75) 4(50,75) 5(0,75) 6(-50,75)
  silkscreen extent -115,-80 85,80, body extent -79,-90 84,91, height 40
TSOP80P1176-44 [mm]
  rect 0.5x1.4 smd: 1(-8.4,-5.7) 2(-7.6,-5.7) 3(-6.8,-5.7) 4(-6,-5.7) 5(-5.2,-5.7) 6(-4.4,-5.7) 7(-3.6,-5.7) 8(-2.8,-5.7) 9(-2,-5.7) 10(-1.2,-5.7) 11(-0.4,-5.7) 12(0.4,-5.7) 13(1.2,-5.7) 14(2,-5.7) 15(2.8,-5.7) 16(3.6,-5.7) 17(4.4,-5.7) 18(5.2,-5.7) 19(6,-5.7) 20(6.8,-5.7) 21(7.6,-5.7) 22(8.4,-5.7) 23(8.4,5.7) 24(7.6,5.7) 25(6.8,5.7) 26(6,5.7) 27(5.2,5.7) 28(4.4,5.7) 29(3.6,5.7) 30(2.8,5.7) 31(2,5.7) 32(1.2,5.7) 33(0.4,5.7) 34(-0.4,5.7) 35(-1.2,5.7) 36(-2,5.7) 37(-2.8,5.7) 38(-3.6,5.7) 39(-4.4,5.7) 40(-5.2,5.7) 41(-6,5.7) 42(-6.8,5.7) 43(-7.6,5.7) 44(-8.4,5.7)
  silkscreen extent -9.29,-5.7 9.26,4.45, body extent -9.24,-5.95 9.26,5.84, height 1
TSOP80P1176-54 [mm] "Plastic Small Outline; 54 Leads; Body Width 10.16 mm"
  rect 0.5x1.4 smd: 1(-10.4,-5.7) 2(-9.6,-5.7) 3(-8.8,-5.7) 4(-8,-5.7) 5(-7.2,-5.7) 6(-6.4,-5.7) 7(-5.6,-5.7) 8(-4.8,-5.7) 9(-4,-5.7) 10(-3.2,-5.7) 11(-2.4,-5.7) 12(-1.6,-5.7) 13(-0.8,-5.7) 14(0,-5.7) 15(0.8,-5.7) 16(1.6,-5.7) 17(2.4,-5.7) 18(3.2,-5.7) 19(4,-5.7) 20(4.8,-5.7) 21(5.6,-5.7) 22(6.4,-5.7) 23(7.2,-5.7) 24(8,-5.7) 25(8.8,-5.7) 26(9.6,-5.7) 27(10.4,-5.7) 28(10.4,5.7) 29(9.6,5.7) 30(8.8,5.7) 31(8,5.7) 32(7.2,5.7) 33(6.4,5.7) 34(5.6,5.7) 35(4.8,5.7) 36(4,5.7) 37(3.2,5.7) 38(2.4,5.7) 39(1.6,5.7) 40(0.8,5.7) 41(0,5.7) 42(-0.8,5.7) 43(-1.6,5.7) 44(-2.4,5.7) 45(-3.2,5.7) 46(-4,5.7) 47(-4.8,5.7) 48(-5.6,5.7) 49(-6.4,5.7) 50(-7.2,5.7) 51(-8,5.7) 52(-8.8,5.7) 53(-9.6,5.7) 54(-10.4,5.7)
  silkscreen extent -11.33,-5.67 11.15,4.4, body extent -11.23,-5.96 11.19,5.97, height 1
XC4VLX25-10FF668C [mm] "BGA, 668-Leads, Body 27x27mm, Pitch 1mm"
  round 0.5 smd: A2(-11.5,12.5) A3(-10.5,12.5) A4(-9.5,12.5) A5(-8.5,12.5) A6(-7.5,12.5) A7(-6.5,12.5) A8(-5.5,12.5) A9(-4.5,12.5) A10(-3.5,12.5) A11(-2.5,12.5) A12(-1.5,12.5) A13(-0.5,12.5) A14(0.5,12.5) A15(1.5,12.5) A16(2.5,12.5) A17(3.5,12.5) A18(4.5,12.5) A19(5.5,12.5) A20(6.5,12.5) A21(7.5,12.5) A22(8.5,12.5) A23(9.5,12.5) A24(10.5,12.5) A25(11.5,12.5) AA1(-12.5,-7.5) AA2(-11.5,-7.5) AA3(-10.5,-7.5) AA4(-9.5,-7.5) AA5(-8.5,-7.5) AA6(-7.5,-7.5) AA7(-6.5,-7.5) AA8(-5.5,-7.5) AA9(-4.5,-7.5) AA10(-3.5,-7.5) AA11(-2.5,-7.5) AA12(-1.5,-7.5) AA13(-0.5,-7.5) AA14(0.5,-7.5) AA15(1.5,-7.5) AA16(2.5,-7.5) AA17(3.5,-7.5) AA18(4.5,-7.5) AA19(5.5,-7.5) AA20(6.5,-7.5) AA21(7.5,-7.5) AA22(8.5,-7.5) AA23(9.5,-7.5) AA24(10.5,-7.5) AA25(11.5,-7.5) AA26(12.5,-7.5) AB1(-12.5,-8.5) AB2(-11.5,-8.5) AB3(-10.5,-8.5) AB4(-9.5,-8.5) AB5(-8.5,-8.5) AB6(-7.5,-8.5) AB7(-6.5,-8.5) AB8(-5.5,-8.5) AB9(-4.5,-8.5) AB10(-3.5,-8.5) AB11(-2.5,-8.5) AB12(-1.5,-8.5) AB13(-0.5,-8.5) AB14(0.5,-8.5) AB15(1.5,-8.5) AB16(2.5,-8.5) AB17(3.5,-8.5) AB18(4.5,-8.5) AB19(5.5,-8.5) AB20(6.5,-8.5) AB21(7.5,-8.5) AB22(8.5,-8.5) AB23(9.5,-8.5) AB24(10.5,-8.5) AB25(11.5,-8.5) AB26(12.5,-8.5) AC1(-12.5,-9.5) AC2(-11.5,-9.5) AC3(-10.5,-9.5) AC4(-9.5,-9.5) AC5(-8.5,-9.5) AC6(-7.5,-9.5) AC7(-6.5,-9.5) AC8(-5.5,-9.5) AC9(-4.5,-9.5) AC10(-3.5,-9.5) AC11(-2.5,-9.5) AC12(-1.5,-9.5) AC13(-0.5,-9.5) AC14(0.5,-9.5) AC15(1.5,-9.5) AC16(2.5,-9.5) AC17(3.5,-9.5) AC18(4.5,-9.5) AC19(5.5,-9.5) AC20(6.5,-9.5) AC21(7.5,-9.5) AC22(8.5,-9.5) AC23(9.5,-9.5) AC24(10.5,-9.5) AC25(11.5,-9.5) AC26(12.5,-9.5) AD1(-12.5,-10.5) AD2(-11.5,-10.5) AD3(-10.5,-10.5) AD4(-9.5,-10.5) AD5(-8.5,-10.5) AD6(-7.5,-10.5) AD7(-6.5,-10.5) AD8(-5.5,-10.5) AD9(-4.5,-10.5) AD10(-3.5,-10.5) AD11(-2.5,-10.5) AD12(-1.5,-10.5) AD13(-0.5,-10.5) AD14(0.5,-10.5) AD15(1.5,-10.5) AD16(2.5,-10.5) AD17(3.5,-10.5) AD18(4.5,-10.5) AD19(5.5,-10.5) AD20(6.5,-10.5) AD21(7.5,-10.5) AD22(8.5,-10.5) AD23(9.5,-10.5) AD24(10.5,-10.5) AD25(11.5,-10.5) AD26(12.5,-10.5) AE1(-12.5,-11.5) AE2(-11.5,-11.5) AE3(-10.5,-11.5) AE4(-9.5,-11.5) AE5(-8.5,-11.5) AE6(-7.5,-11.5) AE7(-6.5,-11.5) AE8(-5.5,-11.5) AE9(-4.5,-11.5) AE10(-3.5,-11.5) AE11(-2.5,-11.5) AE12(-1.5,-11.5) AE13(-0.5,-11.5) AE14(0.5,-11.5) AE15(1.5,-11.5) AE16(2.5,-11.5) AE17(3.5,-11.5) AE18(4.5,-11.5) AE19(5.5,-11.5) AE20(6.5,-11.5) AE21(7.5,-11.5) AE22(8.5,-11.5) AE23(9.5,-11.5) AE24(10.5,-11.5) AE25(11.5,-11.5) AE26(12.5,-11.5) AF2(-11.5,-12.5) AF3(-10.5,-12.5) AF4(-9.5,-12.5) AF5(-8.5,-12.5) AF6(-7.5,-12.5) AF7(-6.5,-12.5) AF8(-5.5,-12.5) AF9(-4.5,-12.5) AF10(-3.5,-12.5) AF11(-2.5,-12.5) AF12(-1.5,-12.5) AF13(-0.5,-12.5) AF14(0.5,-12.5) AF15(1.5,-12.5) AF16(2.5,-12.5) AF17(3.5,-12.5) AF18(4.5,-12.5) AF19(5.5,-12.5) AF20(6.5,-12.5) AF21(7.5,-12.5) AF22(8.5,-12.5) AF23(9.5,-12.5) AF24(10.5,-12.5) AF25(11.5,-12.5) B1(-12.5,11.5) B2(-11.5,11.5) B3(-10.5,11.5) B4(-9.5,11.5) B5(-8.5,11.5) B6(-7.5,11.5) B7(-6.5,11.5) B8(-5.5,11.5) B9(-4.5,11.5) B10(-3.5,11.5) B11(-2.5,11.5) B12(-1.5,11.5) B13(-0.5,11.5) B14(0.5,11.5) B15(1.5,11.5) B16(2.5,11.5) B17(3.5,11.5) B18(4.5,11.5) B19(5.5,11.5) B20(6.5,11.5) B21(7.5,11.5) B22(8.5,11.5) B23(9.5,11.5) B24(10.5,11.5) B25(11.5,11.5) B26(12.5,11.5) C1(-12.5,10.5) C2(-11.5,10.5) C3(-10.5,10.5) C4(-9.5,10.5) C5(-8.5,10.5) C6(-7.5,10.5) C7(-6.5,10.5) C8(-5.5,10.5) C9(-4.5,10.5) C10(-3.5,10.5) C11(-2.5,10.5) C12(-1.5,10.5) C13(-0.5,10.5) C14(0.5,10.5) C15(1.5,10.5) C16(2.5,10.5) C17(3.5,10.5) C18(4.5,10.5) C19(5.5,10.5) C20(6.5,10.5) C21(7.5,10.5) C22(8.5,10.5) C23(9.5,10.5) C24(10.5,10.5) C25(11.5,10.5) C26(12.5,10.5) D1(-12.5,9.5) D2(-11.5,9.5) D3(-10.5,9.5) D4(-9.5,9.5) D5(-8.5,9.5) D6(-7.5,9.5) D7(-6.5,9.5) D8(-5.5,9.5) D9(-4.5,9.5) D10(-3.5,9.5) D11(-2.5,9.5) D12(-1.5,9.5) D13(-0.5,9.5) D14(0.5,9.5) D15(1.5,9.5) D16(2.5,9.5) D17(3.5,9.5) D18(4.5,9.5) D19(5.5,9.5) D20(6.5,9.5) D21(7.5,9.5) D22(8.5,9.5) D23(9.5,9.5) D24(10.5,9.5) D25(11.5,9.5) D26(12.5,9.5) E1(-12.5,8.5) E2(-11.5,8.5) E3(-10.5,8.5) E4(-9.5,8.5) E5(-8.5,8.5) E6(-7.5,8.5) E7(-6.5,8.5) E8(-5.5,8.5) E9(-4.5,8.5) E10(-3.5,8.5) E11(-2.5,8.5) E12(-1.5,8.5) E13(-0.5,8.5) E14(0.5,8.5) E15(1.5,8.5) E16(2.5,8.5) E17(3.5,8.5) E18(4.5,8.5) E19(5.5,8.5) E20(6.5,8.5) E21(7.5,8.5) E22(8.5,8.5) E23(9.5,8.5) E24(10.5,8.5) E25(11.5,8.5) E26(12.5,8.5) F1(-12.5,7.5) F2(-11.5,7.5) F3(-10.5,7.5) F4(-9.5,7.5) F5(-8.5,7.5) F6(-7.5,7.5) F7(-6.5,7.5) F8(-5.5,7.5) F9(-4.5,7.5) F10(-3.5,7.5) F11(-2.5,7.5) F12(-1.5,7.5) F13(-0.5,7.5) F14(0.5,7.5) F15(1.5,7.5) F16(2.5,7.5) F17(3.5,7.5) F18(4.5,7.5) F19(5.5,7.5) F20(6.5,7.5) F21(7.5,7.5) F22(8.5,7.5) F23(9.5,7.5) F24(10.5,7.5) F25(11.5,7.5) F26(12.5,7.5) G1(-12.5,6.5) G2(-11.5,6.5) G3(-10.5,6.5) G4(-9.5,6.5) G5(-8.5,6.5) G6(-7.5,6.5) G7(-6.5,6.5) G8(-5.5,6.5) G9(-4.5,6.5) G10(-3.5,6.5) G11(-2.5,6.5) G12(-1.5,6.5) G13(-0.5,6.5) G14(0.5,6.5) G15(1.5,6.5) G16(2.5,6.5) G17(3.5,6.5) G18(4.5,6.5) G19(5.5,6.5) G20(6.5,6.5) G21(7.5,6.5) G22(8.5,6.5) G23(9.5,6.5) G24(10.5,6.5) G25(11.5,6.5) G26(12.5,6.5) H1(-12.5,5.5) H2(-11.5,5.5) H3(-10.5,5.5) H4(-9.5,5.5) H5(-8.5,5.5) H6(-7.5,5.5) H7(-6.5,5.5) H8(-5.5,5.5) H9(-4.5,5.5) H10(-3.5,5.5) H11(-2.5,5.5) H12(-1.5,5.5) H13(-0.5,5.5) H14(0.5,5.5) H15(1.5,5.5) H16(2.5,5.5) H17(3.5,5.5) H18(4.5,5.5) H19(5.5,5.5) H20(6.5,5.5) H21(7.5,5.5) H22(8.5,5.5) H23(9.5,5.5) H24(10.5,5.5) H25(11.5,5.5) H26(12.5,5.5) J1(-12.5,4.5) J2(-11.5,4.5) J3(-10.5,4.5) J4(-9.5,4.5) J5(-8.5,4.5) J6(-7.5,4.5) J7(-6.5,4.5) J8(-5.5,4.5) J10(-3.5,4.5) J11(-2.5,4.5) J12(-1.5,4.5) J13(-0.5,4.5) J14(0.5,4.5) J15(1.5,4.5) J16(2.5,4.5) J17(3.5,4.5) J19(5.5,4.5) J20(6.5,4.5) J21(7.5,4.5) J22(8.5,4.5) J23(9.5,4.5) J24(10.5,4.5) J25(11.5,4.5) J26(12.5,4.5) K1(-12.5,3.5) K2(-11.5,3.5) K3(-10.5,3.5) K4(-9.5,3.5) K5(-8.5,3.5) K6(-7.5,3.5) K7(-6.5,3.5) K8(-5.5,3.5) K9(-4.5,3.5) K10(-3.5,3.5) K11(-2.5,3.5) K12(-1.5,3.5) K13(-0.5,3.5) K14(0.5,3.5) K15(1.5,3.5) K16(2.5,3.5) K17(3.5,3.5) K18(4.5,3.5) K19(5.5,3.5) K20(6.5,3.5) K21(7.5,3.5) K22(8.5,3.5) K23(9.5,3.5) K24(10.5,3.5) K25(11.5,3.5) K26(12.5,3.5) L1(-12.5,2.5) L2(-11.5,2.5) L3(-10.5,2.5) L4(-9.5,2.5) L5(-8.5,2.5) L6(-7.5,2.5) L7(-6.5,2.5) L8(-5.5,2.5) L9(-4.5,2.5) L10(-3.5,2.5) L11(-2.5,2.5) L12(-1.5,2.5) L13(-0.5,2.5) L14(0.5,2.5) L15(1.5,2.5) L16(2.5,2.5) L17(3.5,2.5) L18(4.5,2.5) L19(5.5,2.5) L20(6.5,2.5) L21(7.5,2.5) L22(8.5,2.5) L23(9.5,2.5) L24(10.5,2.5) L25(11.5,2.5) L26(12.5,2.5) M1(-12.5,1.5) M2(-11.5,1.5) M3(-10.5,1.5) M4(-9.5,1.5) M5(-8.5,1.5) M6(-7.5,1.5) M7(-6.5,1.5) M8(-5.5,1.5) M9(-4.5,1.5) M10(-3.5,1.5) M11(-2.5,1.5) M12(-1.5,1.5) M13(-0.5,1.5) M14(0.5,1.5) M15(1.5,1.5) M16(2.5,1.5) M17(3.5,1.5) M18(4.5,1.5) M19(5.5,1.5) M20(6.5,1.5) M21(7.5,1.5) M22(8.5,1.5) M23(9.5,1.5) M24(10.5,1.5) M25(11.5,1.5) M26(12.5,1.5) N1(-12.5,0.5) N2(-11.5,0.5) N3(-10.5,0.5) N4(-9.5,0.5) N5(-8.5,0.5) N6(-7.5,0.5) N7(-6.5,0.5) N8(-5.5,0.5) N9(-4.5,0.5) N10(-3.5,0.5) N11(-2.5,0.5) N12(-1.5,0.5) N13(-0.5,0.5) N14(0.5,0.5) N15(1.5,0.5) N16(2.5,0.5) N17(3.5,0.5) N18(4.5,0.5) N19(5.5,0.5) N20(6.5,0.5) N21(7.5,0.5) N22(8.5,0.5) N23(9.5,0.5) N24(10.5,0.5) N25(11.5,0.5) N26(12.5,0.5) P1(-12.5,-0.5) P2(-11.5,-0.5) P3(-10.5,-0.5) P4(-9.5,-0.5) P5(-8.5,-0.5) P6(-7.5,-0.5) P7(-6.5,-0.5) P8(-5.5,-0.5) P9(-4.5,-0.5) P10(-3.5,-0.5) P11(-2.5,-0.5) P12(-1.5,-0.5) P13(-0.5,-0.5) P14(0.5,-0.5) P15(1.5,-0.5) P16(2.5,-0.5) P17(3.5,-0.5) P18(4.5,-0.5) P19(5.5,-0.5) P20(6.5,-0.5) P21(7.5,-0.5) P22(8.5,-0.5) P23(9.5,-0.5) P24(10.5,-0.5) P25(11.5,-0.5) P26(12.5,-0.5) R1(-12.5,-1.5) R2(-11.5,-1.5) R3(-10.5,-1.5) R4(-9.5,-1.5) R5(-8.5,-1.5) R6(-7.5,-1.5) R7(-6.5,-1.5) R8(-5.5,-1.5) R9(-4.5,-1.5) R10(-3.5,-1.5) R11(-2.5,-1.5) R12(-1.5,-1.5) R13(-0.5,-1.5) R14(0.5,-1.5) R15(1.5,-1.5) R16(2.5,-1.5) R17(3.5,-1.5) R18(4.5,-1.5) R19(5.5,-1.5) R20(6.5,-1.5) R21(7.5,-1.5) R22(8.5,-1.5) R23(9.5,-1.5) R24(10.5,-1.5) R25(11.5,-1.5) R26(12.5,-1.5) T1(-12.5,-2.5) T2(-11.5,-2.5) T3(-10.5,-2.5) T4(-9.5,-2.5) T5(-8.5,-2.5) T6(-7.5,-2.5) T7(-6.5,-2.5) T8(-5.5,-2.5) T9(-4.5,-2.5) T10(-3.5,-2.5) T11(-2.5,-2.5) T12(-1.5,-2.5) T13(-0.5,-2.5) T14(0.5,-2.5) T15(1.5,-2.5) T16(2.5,-2.5) T17(3.5,-2.5) T18(4.5,-2.5) T19(5.5,-2.5) T20(6.5,-2.5) T21(7.5,-2.5) T22(8.5,-2.5) T23(9.5,-2.5) T24(10.5,-2.5) T25(11.5,-2.5) T26(12.5,-2.5) U1(-12.5,-3.5) U2(-11.5,-3.5) U3(-10.5,-3.5) U4(-9.5,-3.5) U5(-8.5,-3.5) U6(-7.5,-3.5) U7(-6.5,-3.5) U8(-5.5,-3.5) U9(-4.5,-3.5) U10(-3.5,-3.5) U11(-2.5,-3.5) U12(-1.5,-3.5) U13(-0.5,-3.5) U14(0.5,-3.5) U15(1.5,-3.5) U16(2.5,-3.5) U17(3.5,-3.5) U18(4.5,-3.5) U19(5.5,-3.5) U20(6.5,-3.5) U21(7.5,-3.5) U22(8.5,-3.5) U23(9.5,-3.5) U24(10.5,-3.5) U25(11.5,-3.5) U26(12.5,-3.5) V1(-12.5,-4.5) V2(-11.5,-4.5) V3(-10.5,-4.5) V4(-9.5,-4.5) V5(-8.5,-4.5) V6(-7.5,-4.5) V7(-6.5,-4.5) V8(-5.5,-4.5) V10(-3.5,-4.5) V11(-2.5,-4.5) V12(-1.5,-4.5) V13(-0.5,-4.5) V14(0.5,-4.5) V15(1.5,-4.5) V16(2.5,-4.5) V17(3.5,-4.5) V19(5.5,-4.5) V20(6.5,-4.5) V21(7.5,-4.5) V22(8.5,-4.5) V23(9.5,-4.5) V24(10.5,-4.5) V25(11.5,-4.5) V26(12.5,-4.5) W1(-12.5,-5.5) W2(-11.5,-5.5) W3(-10.5,-5.5) W4(-9.5,-5.5) W5(-8.5,-5.5) W6(-7.5,-5.5) W7(-6.5,-5.5) W8(-5.5,-5.5) W9(-4.5,-5.5) W10(-3.5,-5.5) W11(-2.5,-5.5) W12(-1.5,-5.5) W13(-0.5,-5.5) W14(0.5,-5.5) W15(1.5,-5.5) W16(2.5,-5.5) W17(3.5,-5.5) W18(4.5,-5.5) W19(5.5,-5.5) W20(6.5,-5.5) W21(7.5,-5.5) W22(8.5,-5.5) W23(9.5,-5.5) W24(10.5,-5.5) W25(11.5,-5.5) W26(12.5,-5.5) Y1(-12.5,-6.5) Y2(-11.5,-6.5) Y3(-10.5,-6.5) Y4(-9.5,-6.5) Y5(-8.5,-6.5) Y6(-7.5,-6.5) Y7(-6.5,-6.5) Y8(-5.5,-6.5) Y9(-4.5,-6.5) Y10(-3.5,-6.5) Y11(-2.5,-6.5) Y12(-1.5,-6.5) Y13(-0.5,-6.5) Y14(0.5,-6.5) Y15(1.5,-6.5) Y16(2.5,-6.5) Y17(3.5,-6.5) Y18(4.5,-6.5) Y19(5.5,-6.5) Y20(6.5,-6.5) Y21(7.5,-6.5) Y22(8.5,-6.5) Y23(9.5,-6.5) Y24(10.5,-6.5) Y25(11.5,-6.5) Y26(12.5,-6.5)
  silkscreen extent -14.27,-13.5 13.5,13.5, body extent -13.5,-13.61 13.6,13.46, height 2.92